# Altium PCB mla_opamp.PcbDoc (part 1 of 3)
Units mil, origin at the board's own origin, x right, y up, seen from the top; angles counter-clockwise.
Board outline 7165.35 x 3582.68 mil, 4 copper layers (Top Layer, PWD, GND, Bottom Layer), stack 23.756 mil thick; 177 components, 237 nets, 809 pads, 473 vias.
Unrouted connection lines stored in the file: 312.
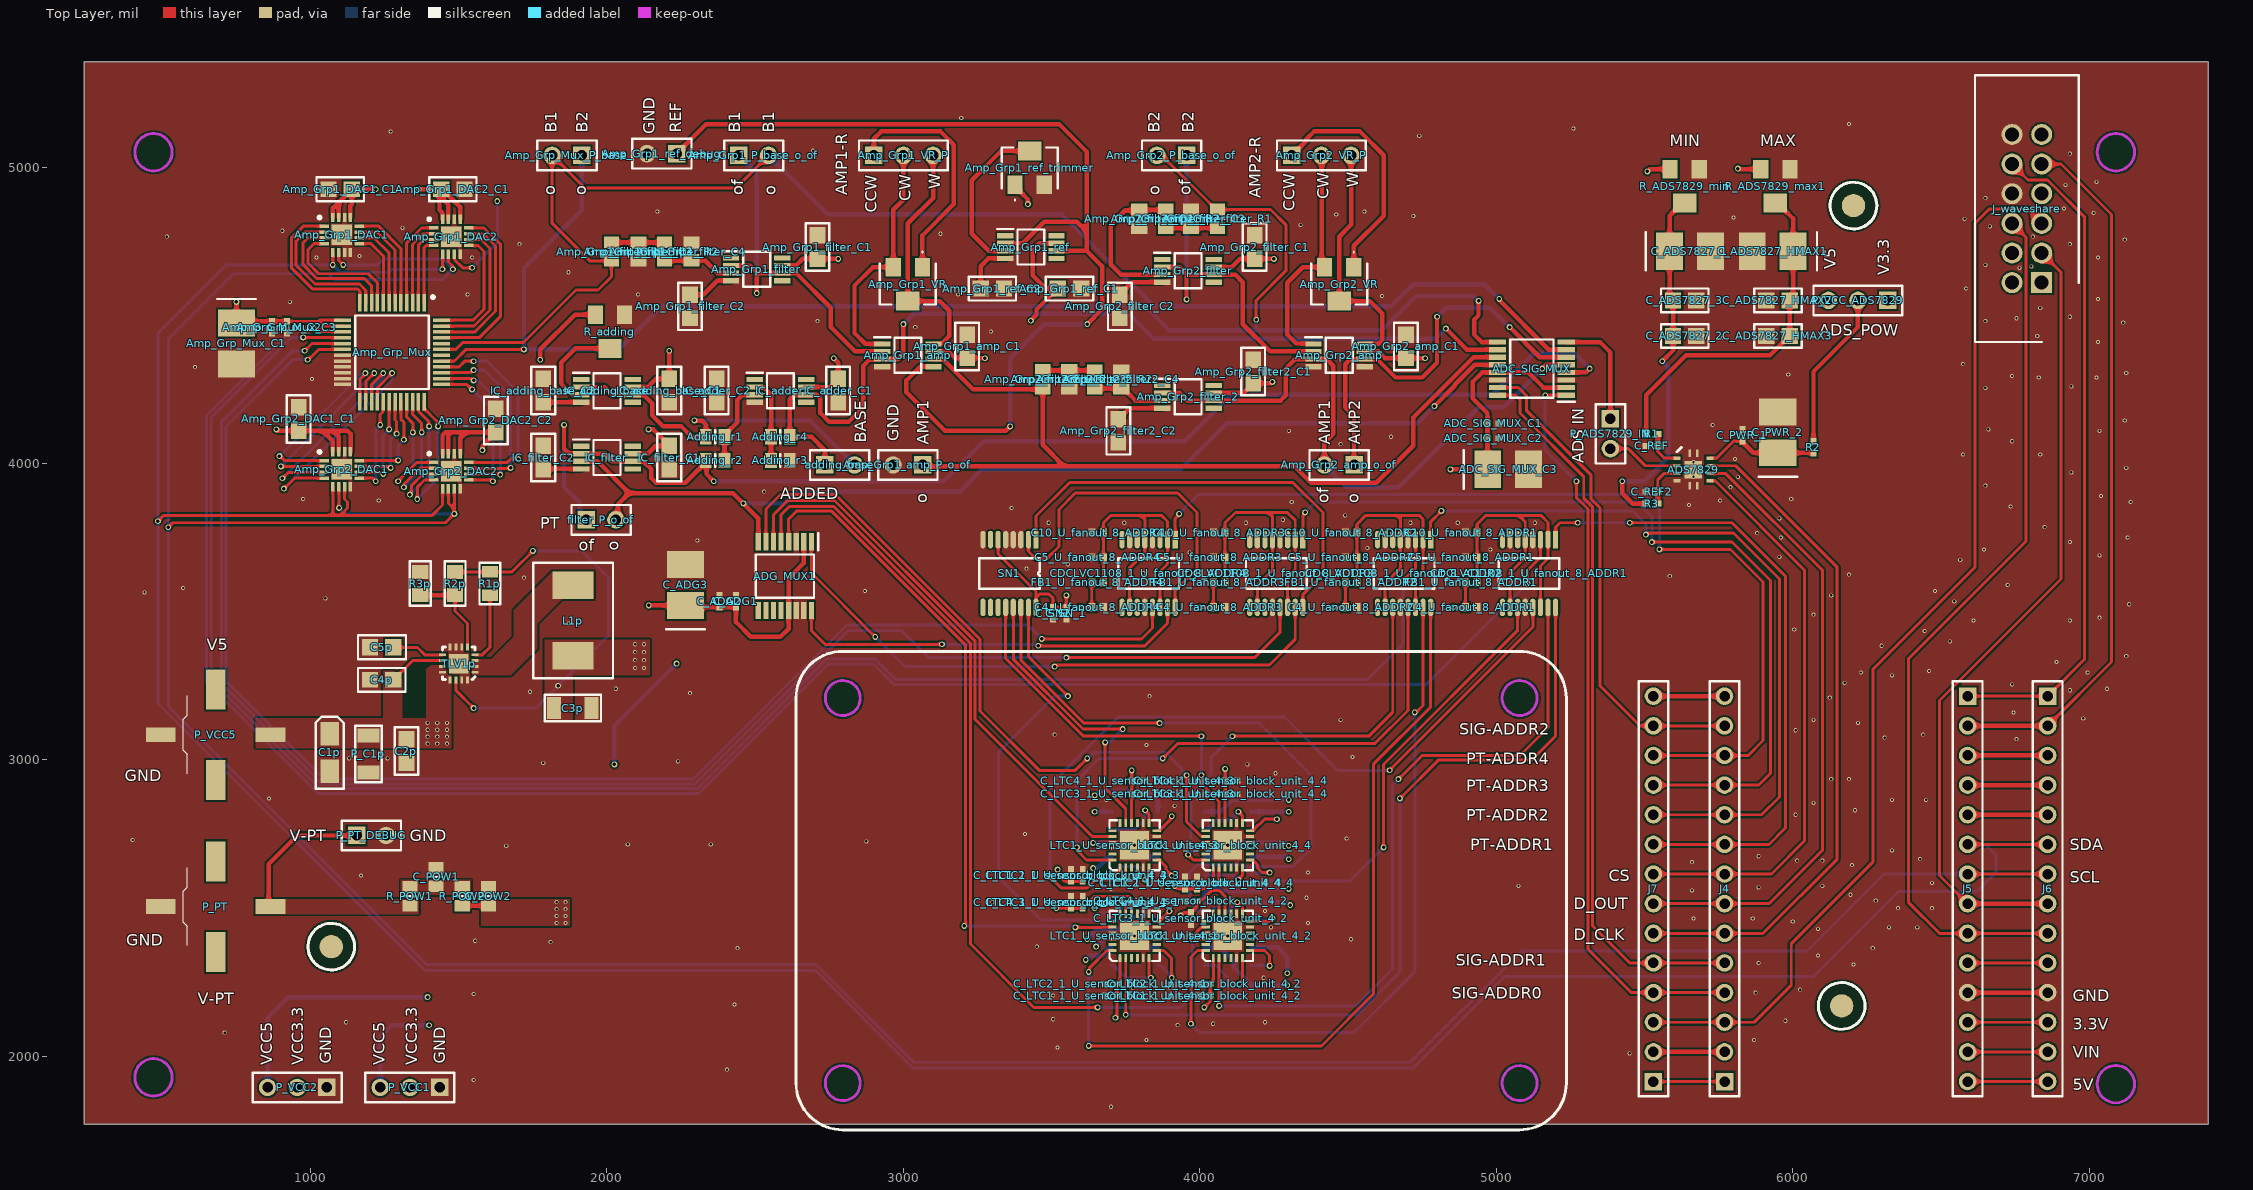
[diagram p0: Top Layer view]
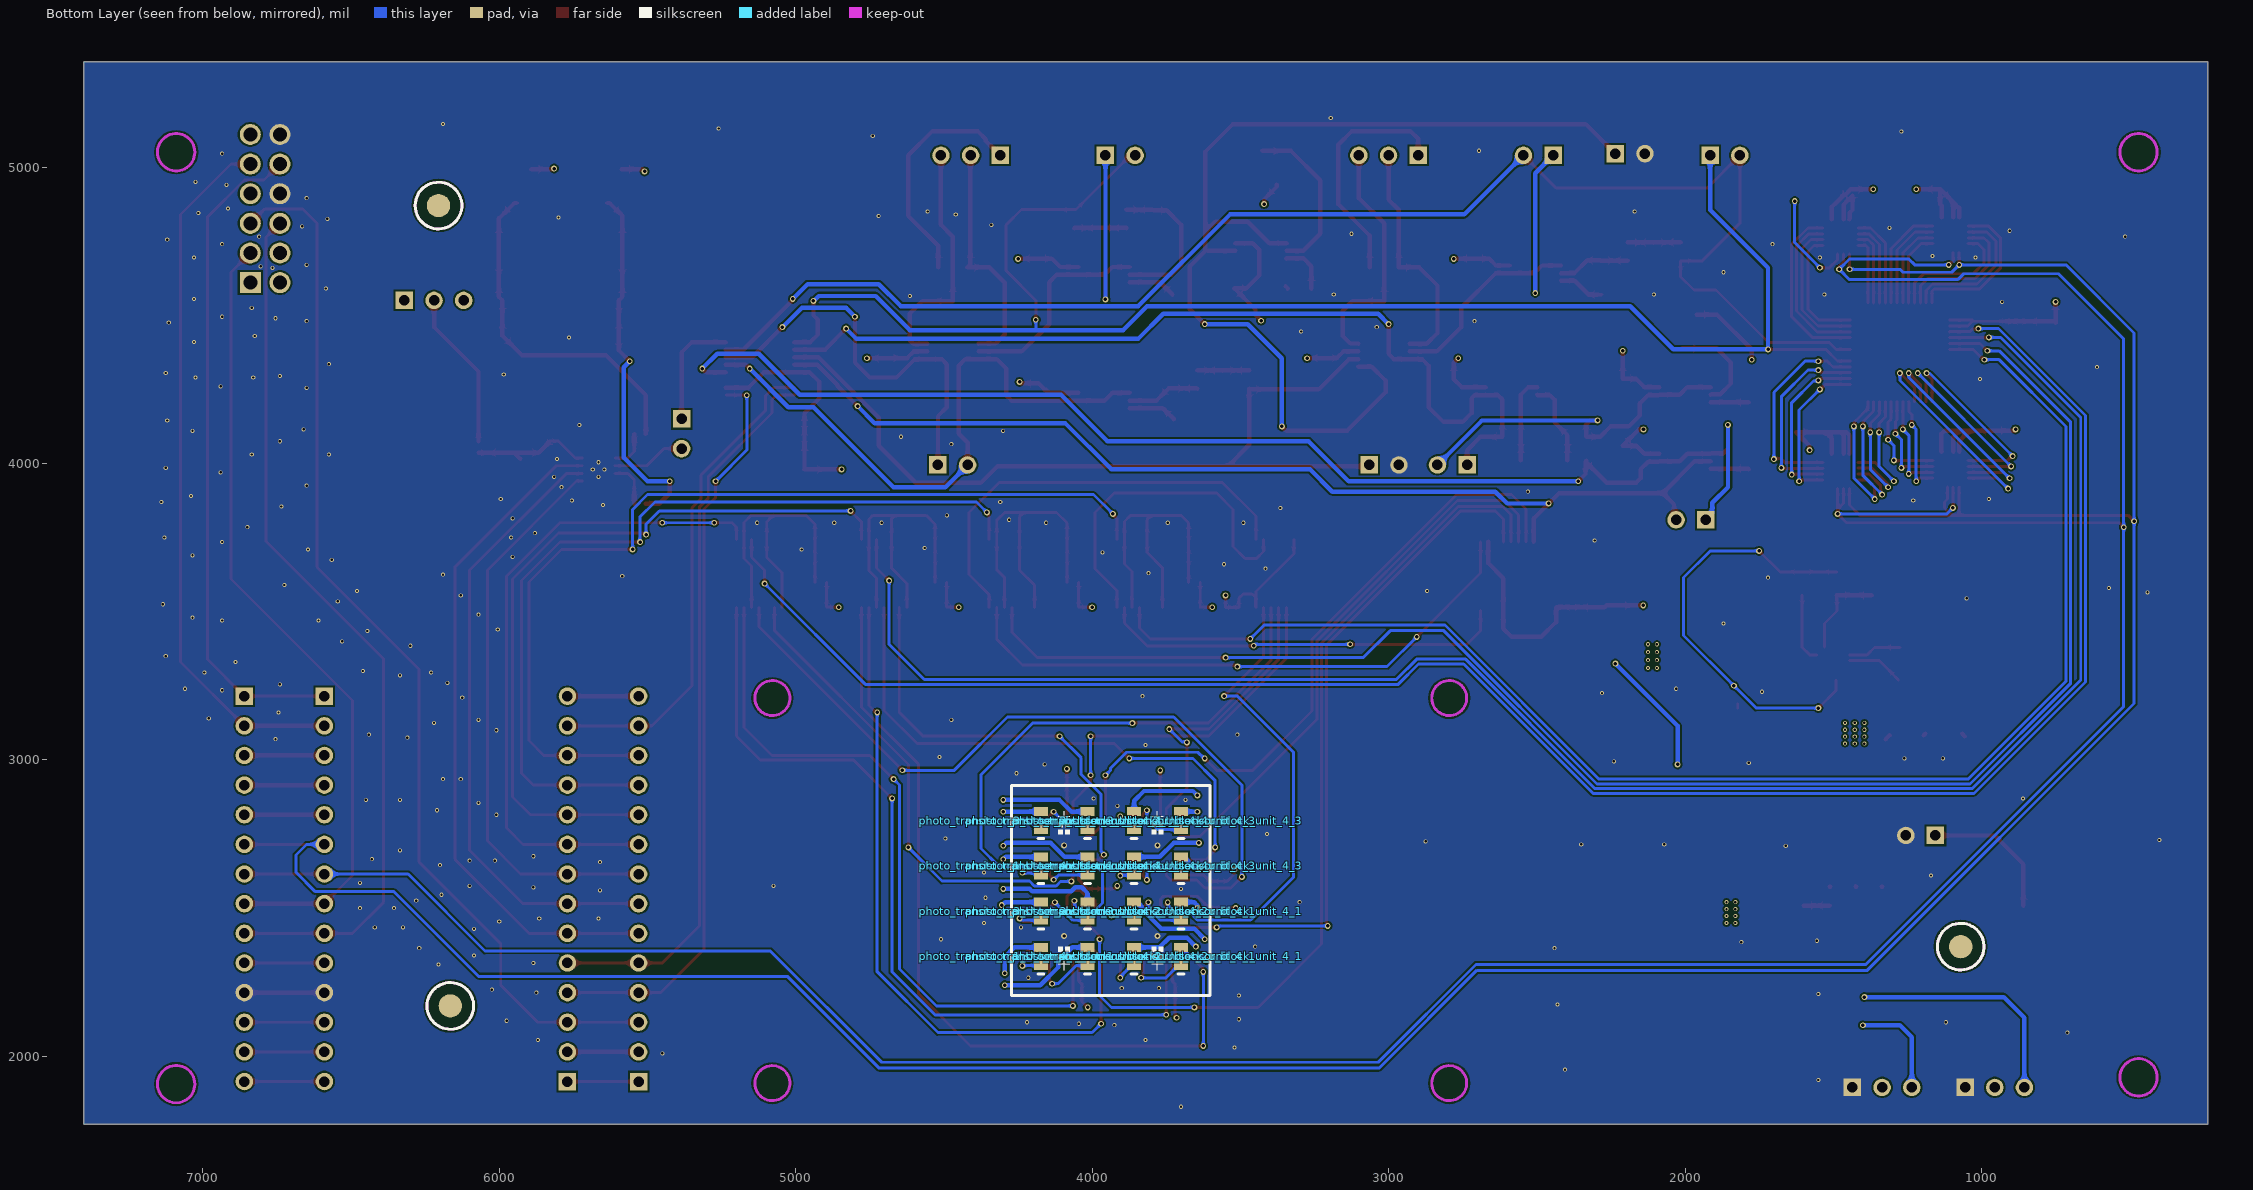
[diagram p1: Bottom Layer view, seen from below]
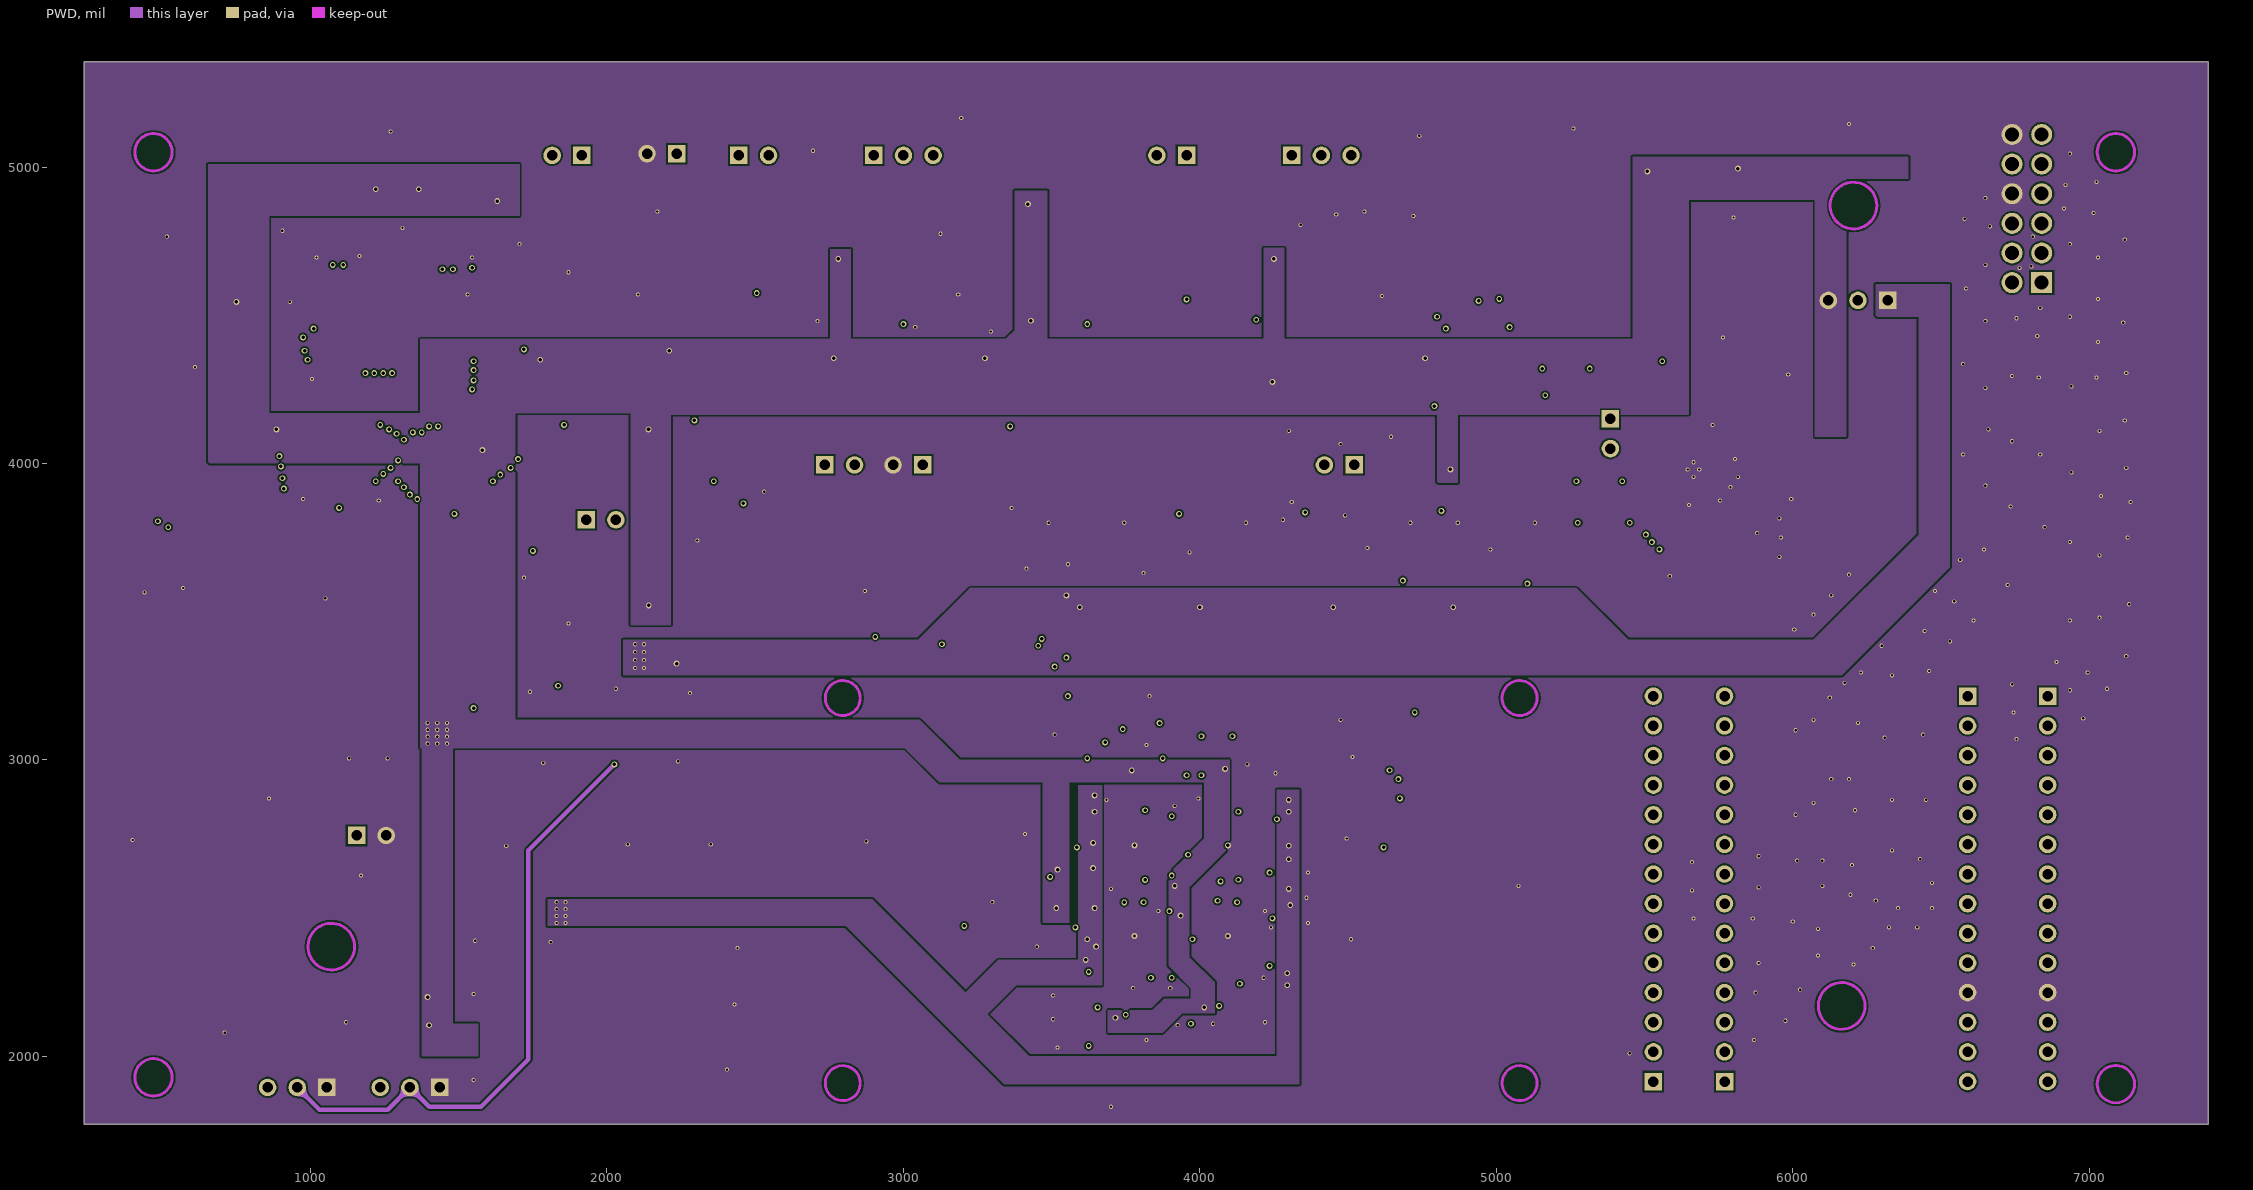
[diagram p2: PWD]
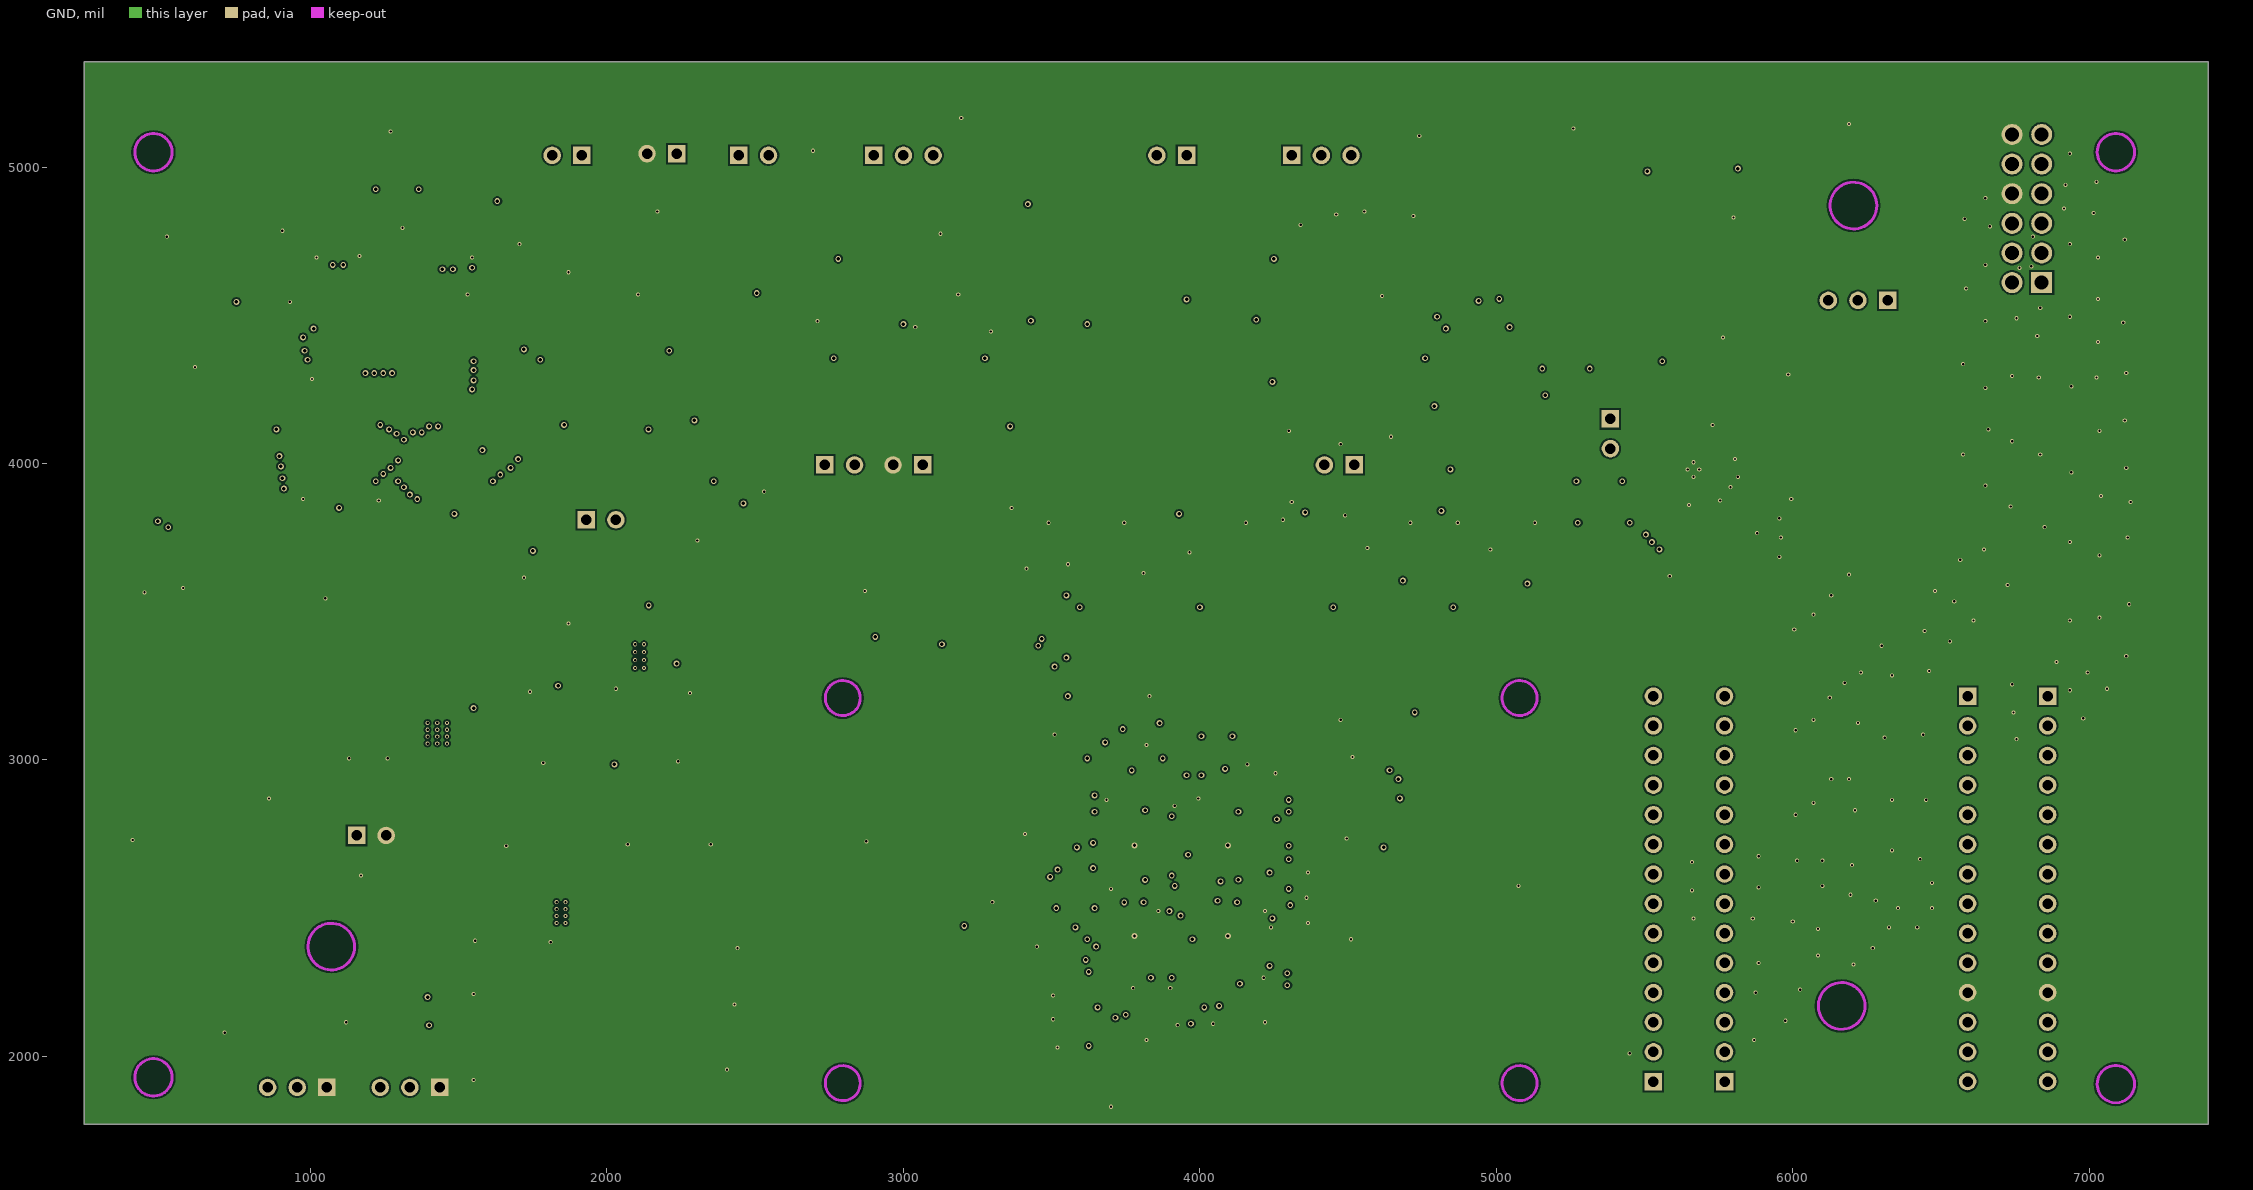
[diagram p3: GND]

## Layer stack, top to bottom
Top Solder: solder mask 0.4, Solder Resist, Dk 3.5
Top Layer: signal copper 1.4
Dielectric 2: prepreg 2.8, PP-006, Dk 4.1
PWD: signal copper 1.378
Dielectric 1: dielectric 12.6, FR-4, Dk 4.8
GND: signal copper 1.378
Dielectric 3: prepreg 2.8, PP-006, Dk 4.1
Bottom Layer: signal copper 1.4
Bottom Solder: solder mask 0.4, Solder Resist, Dk 3.5

## Board outline
236.22,1771.65 7401.57,1771.65 7401.57,5354.33 236.77,5354.33 236.22,5353.78 236.22,5236.22

## Design rules (kind name [scope] priority, off if disabled: settings)
Clearance [All] p1: gap=6 ignorepadtopadclearanceinfootprint=FALSE
HoleSize [All] p1: absolutevalues=TRUE maxlimit=100 minlimit=6 maxpercent=80.000 minpercent=20.000
PlaneConnect PlaneConnect_1 [InNet('GND')] p1: planeconnectstyle=Relief reliefexpansion=20 reliefentries=4 reliefconductorwidth=10 reliefairgap=10
PlaneConnect [All] p2: planeconnectstyle=Relief reliefexpansion=20 reliefentries=4 reliefconductorwidth=10 reliefairgap=10
PolygonConnect [All] p1: connectstyle=Direct reliefconductorwidth=10 reliefentries=4 polygonreliefangle="90 Angle" airgapwidth=10
RoutingVias [All] p1: holewidth=11.81 width=19.68 viastyle="Through Hole" minholewidth=9.84 minwidth=10 maxholewidth=28 maxwidth=50
SolderMaskExpansion [All] p1: expansion=4 istentingtop=FALSE
Width [All] p1: maxlimit=50 minlimit=6 preferedwidth=10
28 further rules are at their usual default settings.

## Classes and differential pairs
channel class sensor_block_unit_4: U_sensor_block_unit_4_1 U_sensor_block_unit_4_2 U_sensor_block_unit_4_3 U_sensor_block_unit_4_4
channel class fanout_8: U_fanout_8_ADDR1 U_fanout_8_ADDR2 U_fanout_8_ADDR3 U_fanout_8_ADDR4
component class U_sensor_module: ADG_MUX1 C_ADG1 C_ADG2 C_ADG3 C_SN2 C_SN_1 SN1
component class U_sensor_block_unit_4_4: C_LTC1_1_U_sensor_block_unit_4_4 C_LTC2_1_U_sensor_block_unit_4_4 C_LTC3_1_U_sensor_block_unit_4_4 C_LTC4_1_U_sensor_block_unit_4_4 LTC1_U_sensor_block_unit_4_4 photo_transistor_1_U_sensor_block_unit_4_4 photo_transistor_2_U_sensor_block_unit_4_4 photo_transistor_3_U_sensor_block_unit_4_4 photo_transistor_4_U_sensor_block_unit_4_4
component class U_sensor_block_unit_4_3: C_LTC1_1_U_sensor_block_unit_4_3 C_LTC2_1_U_sensor_block_unit_4_3 C_LTC3_1_U_sensor_block_unit_4_3 C_LTC4_1_U_sensor_block_unit_4_3 LTC1_U_sensor_block_unit_4_3 photo_transistor_1_U_sensor_block_unit_4_3 photo_transistor_2_U_sensor_block_unit_4_3 photo_transistor_3_U_sensor_block_unit_4_3 photo_transistor_4_U_sensor_block_unit_4_3
component class U_sensor_block_unit_4_2: C_LTC1_1_U_sensor_block_unit_4_2 C_LTC2_1_U_sensor_block_unit_4_2 C_LTC3_1_U_sensor_block_unit_4_2 C_LTC4_1_U_sensor_block_unit_4_2 LTC1_U_sensor_block_unit_4_2 photo_transistor_1_U_sensor_block_unit_4_2 photo_transistor_2_U_sensor_block_unit_4_2 photo_transistor_3_U_sensor_block_unit_4_2 photo_transistor_4_U_sensor_block_unit_4_2
component class U_sensor_block_unit_4_1: C_LTC1_1_U_sensor_block_unit_4_1 C_LTC2_1_U_sensor_block_unit_4_1 C_LTC3_1_U_sensor_block_unit_4_1 C_LTC4_1_U_sensor_block_unit_4_1 LTC1_U_sensor_block_unit_4_1 photo_transistor_1_U_sensor_block_unit_4_1 photo_transistor_2_U_sensor_block_unit_4_1 photo_transistor_3_U_sensor_block_unit_4_1 photo_transistor_4_U_sensor_block_unit_4_1
component class U_power_sheet: C1p C2p C3p C4p C5p L1p P_C1p R1p R2p R3p TLV1p
component class U_fanout_8_ADDR4: C4_U_fanout_8_ADDR4 C5_U_fanout_8_ADDR4 C10_U_fanout_8_ADDR4 CDCLVC1108_1_U_fanout_8_ADDR4 FB1_U_fanout_8_ADDR4
component class U_fanout_8_ADDR3: C4_U_fanout_8_ADDR3 C5_U_fanout_8_ADDR3 C10_U_fanout_8_ADDR3 CDCLVC1108_1_U_fanout_8_ADDR3 FB1_U_fanout_8_ADDR3
component class U_fanout_8_ADDR2: C4_U_fanout_8_ADDR2 C5_U_fanout_8_ADDR2 C10_U_fanout_8_ADDR2 CDCLVC1108_1_U_fanout_8_ADDR2 FB1_U_fanout_8_ADDR2
component class U_fanout_8_ADDR1: C4_U_fanout_8_ADDR1 C5_U_fanout_8_ADDR1 C10_U_fanout_8_ADDR1 CDCLVC1108_1_U_fanout_8_ADDR1 FB1_U_fanout_8_ADDR1
component class U_arduino_mkr_vidor_4000: J4 J5 J6 J7
component class U_amplifier_module: adding_base Adding_r1 Adding_r2 Adding_r3 Adding_r4 Amp_Grp1_amp Amp_Grp1_amp_C1 Amp_Grp1_amp_P_o_of Amp_Grp1_DAC1 Amp_Grp1_DAC1_C1 Amp_Grp1_DAC2 Amp_Grp1_DAC2_C1 Amp_Grp1_filter Amp_Grp1_filter_C1 Amp_Grp1_filter_C2 Amp_Grp1_filter_C3 Amp_Grp1_filter_C4 Amp_Grp1_filter_R1 Amp_Grp1_filter_R2 Amp_Grp1_P_base_o_of Amp_Grp1_ref Amp_Grp1_ref_C1 Amp_Grp1_ref_C2 Amp_Grp1_ref_debug Amp_Grp1_ref_trimmer Amp_Grp1_VR Amp_Grp1_VR_P Amp_Grp2_amp Amp_Grp2_amp_C1 Amp_Grp2_amp_o_of Amp_Grp2_DAC1 Amp_Grp2_DAC1_C1 Amp_Grp2_DAC2 Amp_Grp2_DAC2_C2 Amp_Grp2_filter Amp_Grp2_filter2_C1 Amp_Grp2_filter2_C2 Amp_Grp2_filter2_C3 Amp_Grp2_filter2_C4 Amp_Grp2_filter2_R1 Amp_Grp2_filter2_R2 Amp_Grp2_filter_2 Amp_Grp2_filter_C1 Amp_Grp2_filter_C2 Amp_Grp2_filter_C3 Amp_Grp2_filter_C4 Amp_Grp2_filter_R1 Amp_Grp2_filter_R2 Amp_Grp2_P_base_o_of Amp_Grp2_VR Amp_Grp2_VR_P Amp_Grp_Mux Amp_Grp_Mux_C1 Amp_Grp_Mux_C2 Amp_Grp_Mux_C3 Amp_Grp_Mux_P_base filter_P_o_of IC_adder IC_adder_C1 IC_adder_C2 IC_adding_base IC_adding_base_C1 IC_adding_base_C2 IC_filter IC_filter_C1 IC_filter_C2 R_adding
component class U_ADS7829_module: ADS7829 C_ADS7827_1 C_ADS7827_2 C_ADS7827_3 C_ADS7827_HMAX1 C_ADS7827_HMAX2 C_ADS7827_HMAX3 C_PWR_1 C_PWR_2 C_REF C_REF2 P_VCC_ADS7829 R1 R2 R3 R_ADS7829_max1 R_ADS7829_min
component class mla_opamp_top: ADC_SIG_MUX ADC_SIG_MUX_C1 ADC_SIG_MUX_C2 ADC_SIG_MUX_C3 C_POW1 C_POW2 J_waveshare P_ADS7829_IN P_PT P_PT_DEBUG P_VCC1 P_VCC2 P_VCC5 R_POW1 R_POW2

## Components (designator, comment, footprint, x,y, rotation, side; value= is the part's Value field where it differs from the comment)
ADC_SIG_MUX "ADG708BRUZ-REEL" SOP65P640X120-16N 5120,4320 r180 top
ADC_SIG_MUX_C1 "0402B104K250CT" 0402 4990,4135 r0 top value=100nf
ADC_SIG_MUX_C2 "0402X105K250CT" 0402 4990,4085 r0 top value=1uf
ADC_SIG_MUX_C3 "TAJB685M016RNJ" TAJ_1210 5040,3980 r0 top value=6.8uf
adding_base "77311-102-03LF" HDR1X2 2735,3995 r0 top
Adding_r1 "CRT0805-BY-1002EAS" 6-0805_L 2365,4090 r0 top value=10K
Adding_r2 "CRT0805-BY-1002EAS" 6-0805_L 2365,4010 r0 top value=10K
Adding_r3 "CRT0805-BY-1002EAS" 6-0805_L 2585,4010 r0 top value=10K
Adding_r4 "CRT0805-BY-1002EAS" 6-0805_L 2585,4090 r0 top value=10K
ADG_MUX1 "ADG708BRUZ-REEL" SOP65P640X120-16N 2600,3620 r270 top
ADS7829 "ADS7829IBDRBR" DRB0008A 5665,3979.47 r0 top
Amp_Grp1_amp "LT6370IMS8#TRPBF" SOP65P490X110-8N 3015,4365 r0 top
Amp_Grp1_amp_C1 "CL21B104KBCNNNC" SAMSUNG_CAP_0805 3215,4395 r270 top value=0.1uF
Amp_Grp1_amp_P_o_of "77311-102-03LF" HDR1X2 3065,3995 r180 top
Amp_Grp1_DAC1 "DAC53608RTER" QFN50P300X300X80-17N-D 1105,4770.84 r0 top
Amp_Grp1_DAC1_C1 "CL21B104KBCNNNC" SAMSUNG_CAP_0805 1100,4925 r180 top value=0.1uF
Amp_Grp1_DAC2 "DAC53608RTER" QFN50P300X300X80-17N-D 1475,4765 r0 top
Amp_Grp1_DAC2_C1 "CL21B104KBCNNNC" SAMSUNG_CAP_0805 1480,4925 r0 top value=0.1uF
Amp_Grp1_filter "OPA188AQDGKRQ1" SOP65P490X110-8N 2505,4655 r0 top
Amp_Grp1_filter_C1 "CL21B104KBCNNNC" SAMSUNG_CAP_0805 2710,4730 r270 top value=0.1uF
Amp_Grp1_filter_C2 "CL21B104KBCNNNC" SAMSUNG_CAP_0805 2280,4530 r270 top value=0.1uF
Amp_Grp1_filter_C3 "0805B103K201CT" C0805 2106.31,4715 r90 top value=10nF
Amp_Grp1_filter_C4 "0805B103K201CT" C0805 2285,4715 r270 top value=10nF
Amp_Grp1_filter_R1 "SR0805FR-471KL" 6-0805_L 2015,4715 r90 top value=1K
Amp_Grp1_filter_R2 "SR0805FR-471KL" 6-0805_L 2193.69,4715 r270 top value=1K
Amp_Grp1_P_base_o_of "77311-102-03LF" HDR1X2 2445,5039.37 r0 top
Amp_Grp1_ref "OPA188AQDGKRQ1" SOP65P490X110-8N 3430,4730 r0 top
Amp_Grp1_ref_C1 "CL21B104KBCNNNC" SAMSUNG_CAP_0805 3560,4590 r180 top value=0.1uF
Amp_Grp1_ref_C2 "CL21B104KBCNNNC" SAMSUNG_CAP_0805 3300,4590 r180 top value=0.1uF
Amp_Grp1_ref_debug "77311-102-03LF" HDR1X2 2235,5045 r180 top
Amp_Grp1_ref_trimmer "3224W-1-104G" 3224W1104G 3425.79,4997.09 r90 top
Amp_Grp1_VR "3224W-1-104G" 3224W1104G 3015,4605 r270 top
Amp_Grp1_VR_P "MTP125-1140S1" HDR1X3 2900,5039.37 r0 top
Amp_Grp2_amp "LT6370IMS8#TRPBF" SOP65P490X110-8N 4470,4365 r0 top
Amp_Grp2_amp_C1 "CL21B104KBCNNNC" SAMSUNG_CAP_0805 4695,4395 r270 top value=0.1uF
Amp_Grp2_amp_o_of "77311-102-03LF" HDR1X2 4520,3995 r180 top
Amp_Grp2_DAC1 "DAC53608RTER" QFN50P300X300X80-17N-D 1105,3980 r0 top
Amp_Grp2_DAC1_C1 "CL21B104KBCNNNC" SAMSUNG_CAP_0805 960,4150 r90 top value=0.1uF
Amp_Grp2_DAC2 "DAC53608RTER" QFN50P300X300X80-17N-D 1475,3974.16 r0 top
Amp_Grp2_DAC2_C2 "CL21B104KBCNNNC" SAMSUNG_CAP_0805 1625,4145 r90 top value=0.1uF
Amp_Grp2_filter "OPA188AQDGKRQ1" SOP65P490X110-8N 3960,4650 r0 top
Amp_Grp2_filter2_C1 "CL21B104KBCNNNC" SAMSUNG_CAP_0805 4180,4310 r270 top value=0.1uF
Amp_Grp2_filter2_C2 "CL21B104KBCNNNC" SAMSUNG_CAP_0805 3725,4110 r90 top value=0.1uF
Amp_Grp2_filter2_C3 "0805B103K201CT" C0805 3559.65,4283.5 r90 top value=10nF
Amp_Grp2_filter2_C4 "0805B103K201CT" C0805 3735,4283.5 r270 top value=10nF
Amp_Grp2_filter2_R1 "SR0805FR-471KL" 6-0805_L 3470,4283.5 r90 top value=1K
Amp_Grp2_filter2_R2 "SR0805FR-471KL" 6-0805_L 3645.35,4283.5 r270 top value=1K
Amp_Grp2_filter_2 "OPA188AQDGKRQ1" SOP65P490X110-8N 3960,4225 r0 top
Amp_Grp2_filter_C1 "CL21B104KBCNNNC" SAMSUNG_CAP_0805 4185,4730 r270 top value=0.1uF
Amp_Grp2_filter_C2 "CL21B104KBCNNNC" SAMSUNG_CAP_0805 3730,4530 r90 top value=0.1uF
Amp_Grp2_filter_C3 "0805B103K201CT" C0805 3970.35,4825 r270 top value=10nF
Amp_Grp2_filter_C4 "0805B103K201CT" C0805 3795,4825 r90 top value=10nF
Amp_Grp2_filter_R1 "SR0805FR-471KL" 6-0805_L 4060,4825 r270 top value=1K
Amp_Grp2_filter_R2 "SR0805FR-471KL" 6-0805_L 3884.65,4825 r90 top value=1K
Amp_Grp2_P_base_o_of "77311-102-03LF" HDR1X2 3955,5039.37 r180 top
Amp_Grp2_VR "3224W-1-104G" 3224W1104G 4470,4605 r270 top
Amp_Grp2_VR_P "MTP125-1140S1" HDR1X3 4310,5039.37 r0 top
Amp_Grp_Mux "ADG726BSUZ" QFP50P900X900X120-48N 1275,4375 r270 top locked
Amp_Grp_Mux_C1 "TAJB685M016RNJ" TAJ_1210 750,4405 r270 top value=6.8uf
Amp_Grp_Mux_C2 "0402X105K250CT" 0402 870,4460 r270 top value=1uf
Amp_Grp_Mux_C3 "0402B104K250CT" 0402 920,4460 r270 top value=100nf
Amp_Grp_Mux_P_base "77311-102-03LF" HDR1X2 1915,5039.37 r180 top
C1p "TAJA475K025RNJ" Capacitor_1206_A 1065,3025 r90 top value=4.7uF
C2p "CL21B104KBCNNNC" SAMSUNG_CAP_0805 1323.5,3030 r90 top value=0.1uF
C3p "1206X226K100CT" FH_CAP_1206 1885,3175 r180 top value=22uF
C4_U_fanout_8_ADDR1 "0402X106M100NT" 0402_my 4915.31,3515 r180 top value=10uF (schematic designator C4)
C4_U_fanout_8_ADDR2 "0402X106M100NT" 0402_my 4510.31,3515 r180 top value=10uF (schematic designator C4)
C4_U_fanout_8_ADDR3 "0402X106M100NT" 0402_my 4065,3515 r180 top value=10uF (schematic designator C4)
C4_U_fanout_8_ADDR4 "0402X106M100NT" 0402_my 3655,3515 r180 top value=10uF (schematic designator C4)
C4p "CL21B104KBCNNNC" SAMSUNG_CAP_0805 1240,3270 r0 top value=0.1uF
C5_U_fanout_8_ADDR1 "0402X105K100NT" 0402_my 4915.31,3682.78 r0 top value=1uF (schematic designator C5)
C5_U_fanout_8_ADDR2 "0402X105K100NT" 0402_my 4510.31,3682.78 r0 top value=1uF (schematic designator C5)
C5_U_fanout_8_ADDR3 "0402X105K100NT" 0402_my 4065,3682.78 r0 top value=1uF (schematic designator C5)
C5_U_fanout_8_ADDR4 "0402X105K100NT" 0402_my 3655,3682.78 r0 top value=1uF (schematic designator C5)
C5p "0805B332K500CT" FH_CAP_0805 1240,3380 r180 top value=3.3nF
C10_U_fanout_8_ADDR1 "0402X104K250CT" 0402_my 4915.31,3766.67 r0 top value=100nF (schematic designator C10)
C10_U_fanout_8_ADDR2 "0402X104K250CT" 0402_my 4510.31,3766.67 r0 top value=100nF (schematic designator C10)
C10_U_fanout_8_ADDR3 "0402X104K250CT" 0402_my 4065,3766.67 r0 top value=100nF (schematic designator C10)
C10_U_fanout_8_ADDR4 "0402X104K250CT" 0402_my 3655,3766.67 r0 top value=100nF (schematic designator C10)
C_ADG1 "0402B104K250CT" 0402 2435,3534.68 r90 top value=100nf
C_ADG2 "0402X105K250CT" 0402 2380,3535 r90 top value=1uf
C_ADG3 "TAJB685M016RNJ" TAJ_1210 2265,3590 r90 top value=6.8uf
C_ADS7827_1 "TAJB685M016RNJ" TAJ_1210 5653.36,4715.83 r0 top value=6.8uf
C_ADS7827_2 "CL21B104KBCNNNC" SAMSUNG_CAP_0805 5635.68,4430 r180 top value=0.1uF
C_ADS7827_3 "0805B102J500NT" SAMSUNG_CAP_0805 5635.68,4550 r180 top value=1nF
C_ADS7827_HMAX1 "TAJB685M016RNJ" TAJ_1210 5932.14,4715.83 r180 top value=6.8uf
C_ADS7827_HMAX2 "CL21B104KBCNNNC" SAMSUNG_CAP_0805 5950,4550 r0 top value=0.1uF
C_ADS7827_HMAX3 "0805B102J500NT" SAMSUNG_CAP_0805 5950,4430 r0 top value=1nF
C_LTC1_1_U_sensor_block_unit_4_1 "0402B104K250CT" 0402 3700,2205 r180 top value=100nf (schematic designator C_LTC1_1)
C_LTC1_1_U_sensor_block_unit_4_2 "0402B104K250CT" 0402 4015,2205 r180 top value=100nf (schematic designator C_LTC1_1)
C_LTC1_1_U_sensor_block_unit_4_3 "0402B104K250CT" 0402 3565,2610.32 r90 top value=100nf (schematic designator C_LTC1_1)
C_LTC1_1_U_sensor_block_unit_4_4 "0402B104K250CT" 0402 3950,2585 r90 top locked value=100nf (schematic designator C_LTC1_1)
C_LTC2_1_U_sensor_block_unit_4_1 "CC0402KRX7R9BB102" 0402 3700,2245 r180 top value=1nf (schematic designator C_LTC2_1)
C_LTC2_1_U_sensor_block_unit_4_2 "CC0402KRX7R9BB102" 0402 4015,2245 r180 top value=1nf (schematic designator C_LTC2_1)
C_LTC2_1_U_sensor_block_unit_4_3 "CC0402KRX7R9BB102" 0402 3605,2610.32 r90 top value=1nf (schematic designator C_LTC2_1)
C_LTC2_1_U_sensor_block_unit_4_4 "CC0402KRX7R9BB102" 0402 3990,2585 r90 top locked value=1nf (schematic designator C_LTC2_1)
C_LTC3_1_U_sensor_block_unit_4_1 "CC0402KRX7R9BB102" 0402 3605,2520 r90 top value=1nf (schematic designator C_LTC3_1)
C_LTC3_1_U_sensor_block_unit_4_2 "CC0402KRX7R9BB102" 0402 3970,2465 r270 top value=1nf (schematic designator C_LTC3_1)
C_LTC3_1_U_sensor_block_unit_4_3 "CC0402KRX7R9BB102" 0402 3790,2885 r0 top value=1nf (schematic designator C_LTC3_1)
C_LTC3_1_U_sensor_block_unit_4_4 "CC0402KRX7R9BB102" 0402 4105,2885 r0 top locked value=1nf (schematic designator C_LTC3_1)
C_LTC4_1_U_sensor_block_unit_4_1 "0402B104K250CT" 0402 3565,2520 r90 top value=100nf (schematic designator C_LTC4_1)
C_LTC4_1_U_sensor_block_unit_4_2 "0402B104K250CT" 0402 3970,2525 r180 top value=100nf (schematic designator C_LTC4_1)
C_LTC4_1_U_sensor_block_unit_4_3 "0402B104K250CT" 0402 3790,2930 r0 top value=100nf (schematic designator C_LTC4_1)
C_LTC4_1_U_sensor_block_unit_4_4 "0402B104K250CT" 0402 4105,2930 r0 top locked value=100nf (schematic designator C_LTC4_1)
C_POW1 "0805B103J101CT" 6-0805_L 1423.33,2605 r90 top value=10nf
C_POW2 "0805B103J101CT" 6-0805_L 1600,2540 r90 top value=10nf
C_PWR_1 "0402B104K250CT" 0402 5830,4095 r90 top value=100nf
C_PWR_2 "TAJB685M016RNJ" TAJ_1210 5950,4105 r90 top value=6.8uf
C_REF "0402B104K250CT" 0402 5525,4059.47 r180 top value=100nf
C_REF2 "0402B104K250CT" 0402 5525,3904.47 r180 top value=100nf
C_SN2 "0402B104K250CT" 0402 3505,3495 r270 top value=100nf
C_SN_1 "0402X105K250CT" 0402 3550,3495 r270 top value=1uf
CDCLVC1108_1_U_fanout_8_ADDR1 "CDCLVC1108PWR" PW16_NEW 5200,3743.03 r270 top (schematic designator CDCLVC1108_1)
CDCLVC1108_1_U_fanout_8_ADDR2 "CDCLVC1108PWR" PW16_NEW 4778.68,3743.03 r270 top (schematic designator CDCLVC1108_1)
CDCLVC1108_1_U_fanout_8_ADDR3 "CDCLVC1108PWR" PW16_NEW 4347.36,3743.03 r270 top (schematic designator CDCLVC1108_1)
CDCLVC1108_1_U_fanout_8_ADDR4 "CDCLVC1108PWR" PW16_NEW 3916.77,3743.03 r270 top (schematic designator CDCLVC1108_1)
FB1_U_fanout_8_ADDR1 "CBG100505U500T" 0402_my 4915.31,3598.89 r0 top (schematic designator FB1)
FB1_U_fanout_8_ADDR2 "CBG100505U500T" 0402_my 4510.31,3598.89 r0 top (schematic designator FB1)
FB1_U_fanout_8_ADDR3 "CBG100505U500T" 0402_my 4065,3598.89 r0 top (schematic designator FB1)
FB1_U_fanout_8_ADDR4 "CBG100505U500T" 0402_my 3655,3598.89 r0 top (schematic designator FB1)
filter_P_o_of "77311-102-03LF" HDR1X2 1930,3810 r0 top
IC_adder "OPA188AQDGKRQ1" SOP65P490X110-8N 2585,4245 r0 top
IC_adder_C1 "CL21B104KBCNNNC" SAMSUNG_CAP_0805 2780,4245.98 r90 top value=0.1uF
IC_adder_C2 "CL21B104KBCNNNC" SAMSUNG_CAP_0805 2370,4245.98 r90 top value=0.1uF
IC_adding_base "OPA188AQDGKRQ1" SOP65P490X110-8N 2000,4245 r0 top
IC_adding_base_C1 "CL21B104KBCNNNC" SAMSUNG_CAP_0805 2210,4245.98 r90 top value=0.1uF
IC_adding_base_C2 "CL21B104KBCNNNC" SAMSUNG_CAP_0805 1785,4245.98 r90 top value=0.1uF
IC_filter "OPA188AQDGKRQ1" SOP65P490X110-8N 2000,4020 r0 top
IC_filter_C1 "CL21B104KBCNNNC" SAMSUNG_CAP_0805 2210,4020 r90 top value=0.1uF
IC_filter_C2 "CL21B104KBCNNNC" SAMSUNG_CAP_0805 1785,4020 r90 top value=0.1uF
J4 "MTP125-1140S1" HDR1X14 5770,1915 r90 top
J5 "MTP125-1140S1" HDR1X14 6590,3215 r270 top
J6 "MTP125-1140S1" HDR1X14 6860,3215 r270 top
J7 "MTP125-1140S1" HDR1X14 5530,1915 r90 top
J_waveshare "70246-1201" SHDR12W99P254_2X6_2286X889X927P 6840,4610 r90 top locked
L1p "AMRU000606302R2MA1" INDUCTOR_0630 1885,3470 r270 top value=2.2uH
LTC1_U_sensor_block_unit_4_1 "LTC6561IUF#PBF" LTC-DWG 3779.53,2406.3 r90 top (schematic designator LTC1)
LTC1_U_sensor_block_unit_4_2 "LTC6561IUF#PBF" LTC-DWG 4094.49,2406.3 r90 top (schematic designator LTC1)
LTC1_U_sensor_block_unit_4_3 "LTC6561IUF#PBF" LTC-DWG 3779.53,2711.81 r90 top (schematic designator LTC1)
LTC1_U_sensor_block_unit_4_4 "LTC6561IUF#PBF" LTC-DWG 4094.49,2711.81 r90 top locked (schematic designator LTC1)
P_ADS7829_IN "MTP125-1140S1" HDR1X2 5385,4150 r270 top
P_C1p "1206B106K250CT" FH_CAP_1206 1195.25,3020 r90 top value=10uF
P_PT "430450218" 430450218 680,2505 r90 top
P_PT_DEBUG "MTP125-1140S1" HDR1X2 1155,2745 r0 top
P_VCC1 "MTP125-1140S1" HDR1X3 1435,1895 r180 top
P_VCC2 "MTP125-1140S1" HDR1X3 1055,1895 r180 top
P_VCC5 "430450218" 430450218 680,3085 r90 top
P_VCC_ADS7829 "MTP125-1140S1" HDR1X3 6320,4550 r180 top
photo_transistor_1_U_sensor_block_unit_4_1 "TEMT6200FX01" TEMT6200FX01_L 3858.27,2337.01 r90 bottom (schematic designator photo_transistor_1)
photo_transistor_1_U_sensor_block_unit_4_2 "TEMT6200FX01" TEMT6200FX01_L 4173.23,2337.01 r90 bottom (schematic designator photo_transistor_1)
photo_transistor_1_U_sensor_block_unit_4_3 "TEMT6200FX01" TEMT6200FX01_L 3858.27,2642.52 r90 bottom (schematic designator photo_transistor_1)
photo_transistor_1_U_sensor_block_unit_4_4 "TEMT6200FX01" TEMT6200FX01_L 4173.23,2642.52 r90 bottom (schematic designator photo_transistor_1)
photo_transistor_2_U_sensor_block_unit_4_1 "TEMT6200FX01" TEMT6200FX01_L 3700.79,2489.76 r90 bottom (schematic designator photo_transistor_2)
photo_transistor_2_U_sensor_block_unit_4_2 "TEMT6200FX01" TEMT6200FX01_L 4015.75,2489.76 r90 bottom (schematic designator photo_transistor_2)
photo_transistor_2_U_sensor_block_unit_4_3 "TEMT6200FX01" TEMT6200FX01_L 3700.79,2795.28 r90 bottom (schematic designator photo_transistor_2)
photo_transistor_2_U_sensor_block_unit_4_4 "TEMT6200FX01" TEMT6200FX01_L 4015.75,2795.28 r90 bottom (schematic designator photo_transistor_2)
photo_transistor_3_U_sensor_block_unit_4_1 "TEMT6200FX01" TEMT6200FX01_L 3858.27,2489.76 r90 bottom (schematic designator photo_transistor_3)
photo_transistor_3_U_sensor_block_unit_4_2 "TEMT6200FX01" TEMT6200FX01_L 4173.23,2489.76 r90 bottom (schematic designator photo_transistor_3)
photo_transistor_3_U_sensor_block_unit_4_3 "TEMT6200FX01" TEMT6200FX01_L 3858.27,2795.28 r90 bottom (schematic designator photo_transistor_3)
photo_transistor_3_U_sensor_block_unit_4_4 "TEMT6200FX01" TEMT6200FX01_L 4173.23,2795.28 r90 bottom (schematic designator photo_transistor_3)
photo_transistor_4_U_sensor_block_unit_4_1 "TEMT6200FX01" TEMT6200FX01_L 3700.79,2337.01 r90 bottom (schematic designator photo_transistor_4)
photo_transistor_4_U_sensor_block_unit_4_2 "TEMT6200FX01" TEMT6200FX01_L 4015.75,2337.01 r90 bottom (schematic designator photo_transistor_4)
photo_transistor_4_U_sensor_block_unit_4_3 "TEMT6200FX01" TEMT6200FX01_L 3700.79,2642.52 r90 bottom (schematic designator photo_transistor_4)
photo_transistor_4_U_sensor_block_unit_4_4 "TEMT6200FX01" TEMT6200FX01_L 4015.75,2642.52 r90 bottom (schematic designator photo_transistor_4)
R1 "0402WGJ0100TCE" 0402 5525,4099.46 r0 top value=10ohm
R1p "RC0805FR-07100KL" YAGEO_R_0805 1605,3595 r270 top value=100K
R2 "0402WGJ0100TCE" 0402 6070,4055 r90 top value=10ohm
R2p "RC0805FR-07750KL" UNIOHM_R_0805 1487.5,3595 r270 top value=750K
R3 "0402WGJ0100TCE" 0402 5525,3864.46 r0 top value=10ohm
R3p "RC0805FR-07240KL" UNIOHM_R_0805 1370,3595 r90 top value=240K
R_adding "3224W-2-202E" 3324W 2010,4445 r90 top
R_ADS7829_max1 "3224W-2-202E" 3324W 5941.04,4935.83 r90 top
R_ADS7829_min "3224W-2-202E" 3324W 5635.68,4935.83 r90 top
R_POW1 "RC0805FR-0749R9P" 6-0805_L 1335,2540 r90 top value="50 ohm"
R_POW2 "RC0805FR-0749R9P" 6-0805_L 1511.67,2540 r270 top value="50 ohm"
SN1 "SN74HC138PWR" TSSOP16 3447.36,3743.03 r270 top
TLV1p "TLV62130ARGTR" VQFN_16 1500,3325 r180 top

## Footprints (in the part's own frame and the unit in brackets; to place one, negate y for a bottom-side part, rotate by r counter-clockwise, add the part's x,y. Pads: shape width x height; smd on the part's side, far side on the other; paste and mask are expansions set on the pad)
6-0805_L [mm] "Chip Resistor, Body 2.0x1.2mm, IPC High Density"
  rect 1x1.3 smd: 1(-0.8,0) 2(0.8,0)
  silkscreen extent 0,-0.55 0,0.55, body extent -1.07,-0.7 1.07,0.7, height 0.7
0402 [mm] "Chip Capacitor, Body 1.0x0.5mm, IPC High Density"
  rect 0.6x0.5 smd: 1(-0.5,0) 2(0.5,0)
  body extent -0.55,-0.3 0.55,0.3, height 1.3
0402_my [mm]
  rect 0.6x0.7 smd: 1(-0.5,0) 2(0.5,0)
3224W1104G [mm]
  rect 1.6x1.3 smd: 1(-1.45,1.25) 3(-1.45,-1.25)
  rect 1.6x2 smd: 2(1.45,0)
  silkscreen extent -2.8,-2.4 1.75,2.4, body extent -2.12,-2.4 2.09,2.4, height 5.65
3324W [mm]
  rect 1.6x1.3 smd: CCW(1.45,-1.25) CW(1.45,1.25)
  rect 1.6x2 smd: W(-1.45,0)
430450218 [mm]
  rect 1.27x2.54 smd: 1(0,-4.7) 2(0,4.7)
  rect 3.43x1.65 smd: 3(-3.885,0) 3(3.885,0)
  silkscreen extent -3.32,2.45 3.32,2.79
C0805 [mm] "Chip Capacitor, Body 2.0x1.3mm, IPC High Density"
  rect 1.1x1.4 smd: 1(-0.75,0) 2(0.75,0)
  body extent -1.1,-0.72 1.1,0.72, height 1.4
Capacitor_1206_A [mm]
  rect 2x1.6 smd: 1(1.6,0) 2(-1.6,0)
  silkscreen extent -3.1,-1.19 3.07,1.22
DRB0008A [mm]
  rect 0.6x0.31 smd: 1(-1.4,0.975) 2(-1.4,0.325) 3(-1.4,-0.325) 4(-1.4,-0.975) 5(1.4,-0.975) 6(1.4,-0.325) 7(1.4,0.325) 8(1.4,0.975)
  rect 0.23x0.625 smd: 9(-0.325,-1.4) 9(-0.325,1.4) 9(0.325,-1.4) 9(0.325,1.4)
  rect 1.5x1.5 smd: 9(0,0)
  silkscreen extent -1.4,1.52 -1.02,1.91
FH_CAP_0805 [mm]
  rect 1.4x1.45 smd: 1(-1,0) 2(1,0)
  silkscreen extent -2.08,-1.02 2.03,1.02
FH_CAP_1206 [mm]
  rect 1.2x1.9 smd: 1(-1.6,0) 2(1.6,0)
  silkscreen extent -2.41,-1.14 2.41,1.14
HDR1X2 [mm] "Connector; Header; 2 Position"
  rect 1.5x1.5 hole 0.9: 1(0,0)
  round 1.5 hole 0.9: 2(2.54,0)
  silkscreen extent -1.27,-1.27 3.81,1.27
HDR1X3 [mm] "Connector; Header; 3 Position"
  rect 1.5x1.5 hole 0.9: 1(0,0)
  round 1.5 hole 0.9: 2(2.54,0) 3(5.08,0)
  silkscreen extent -1.27,-1.27 6.35,1.27
HDR1X14 [mm] "Connector; Header; 14 Position"
  rect 1.5x1.5 hole 0.9: 1(0,0)
  round 1.5 hole 0.9: 2(2.54,0) 3(5.08,0) 4(7.62,0) 5(10.16,0) 6(12.7,0) 7(15.24,0) 8(17.78,0) 9(20.32,0) 10(22.86,0) 11(25.4,0) 12(27.94,0) 13(30.48,0) 14(33.02,0)
  silkscreen extent -1.27,-1.27 34.29,1.27
INDUCTOR_0630 [mm] "0630_06030"
  rect 2.35x3.5 smd: 1(-3.025,0) 2(3.025,0)
  silkscreen extent -4.95,-3.4 4.95,3.43
LTC-DWG [mm]
  oval 0.7x0.25 smd: 1(-1.9,1.25)
  rect 0.7x0.25 smd: 2(-1.9,0.75) 3(-1.9,0.25) 4(-1.9,-0.25) 5(-1.9,-0.75) 6(-1.9,-1.25) 13(1.9,-1.25) 14(1.9,-0.75) 15(1.9,-0.25) 16(1.9,0.25) 17(1.9,0.75) 18(1.9,1.25)
  rect 0.25x0.7 smd: 7(-1.25,-1.9) 8(-0.75,-1.9) 9(-0.25,-1.9) 10(0.25,-1.9) 11(0.75,-1.9) 12(1.25,-1.9) 19(1.25,1.9) 20(0.75,1.9) 21(0.25,1.9) 22(-0.25,1.9) 23(-0.75,1.9) 24(-1.25,1.9)
  rect 2.45x2.45 smd: 25(0,0)
  silkscreen extent -2.15,-2.15 2.15,2.15
PW16_NEW [mm]
  rect 1.5x0.45 smd: 1(0,0)
  oval 1.5x0.45 smd: 2(0,-0.65) 3(0,-1.3) 4(0,-1.95) 5(0,-2.6) 6(0,-3.25) 7(0,-3.9) 8(0,-4.55) 9(5.8,-4.55) 10(5.8,-3.9) 11(5.8,-3.25) 12(5.8,-2.6) 13(5.8,-1.95) 14(5.8,-1.3) 15(5.8,-0.65) 16(5.8,0)
  silkscreen extent 1.58,-4.88 4.22,0.33
QFN50P300X300X80-17N-D [mm]
  rect 0.8x0.3 smd: 1(-1.5,0.75) 2(-1.5,0.25) 3(-1.5,-0.25) 4(-1.5,-0.75) 9(1.5,-0.75) 10(1.5,-0.25) 11(1.5,0.25) 12(1.5,0.75)
  rect 0.3x0.8 smd: 5(-0.75,-1.5) 6(-0.25,-1.5) 7(0.25,-1.5) 8(0.75,-1.5) 13(0.75,1.5) 14(0.25,1.5) 15(-0.25,1.5) 16(-0.75,1.5)
  rect 1.76x1.76 smd: 17(0,0)
  silkscreen extent -2.02,1.38 -1.77,1.62, body extent -1.5,-1.5 1.5,1.5, height 0.8
QFP50P900X900X120-48N [mm]
  rect 1.475x0.3 smd: 1(-4.238,2.75) 2(-4.238,2.25) 3(-4.238,1.75) 4(-4.238,1.25) 5(-4.238,0.75) 6(-4.238,0.25) 7(-4.238,-0.25) 8(-4.238,-0.75) 9(-4.238,-1.25) 10(-4.238,-1.75) 11(-4.238,-2.25) 12(-4.238,-2.75) 25(4.238,-2.75) 26(4.238,-2.25) 27(4.238,-1.75) 28(4.238,-1.25) 29(4.238,-0.75) 30(4.238,-0.25) 31(4.238,0.25) 32(4.238,0.75) 33(4.238,1.25) 34(4.238,1.75) 35(4.238,2.25) 36(4.238,2.75)
  rect 0.3x1.475 smd: 13(-2.75,-4.238) 14(-2.25,-4.238) 15(-1.75,-4.238) 16(-1.25,-4.238) 17(-0.75,-4.238) 18(-0.25,-4.238) 19(0.25,-4.238) 20(0.75,-4.238) 21(1.25,-4.238) 22(1.75,-4.238) 23(2.25,-4.238) 24(2.75,-4.238) 37(2.75,4.238) 38(2.25,4.238) 39(1.75,4.238) 40(1.25,4.238) 41(0.75,4.238) 42(0.25,4.238) 43(-0.25,4.238) 44(-0.75,4.238) 45(-1.25,4.238) 46(-1.75,4.238) 47(-2.25,4.238) 48(-2.75,4.238)
  silkscreen extent -4.85,-3.15 3.15,3.63, body extent -4.5,-4.5 4.5,4.5, height 1.2
SAMSUNG_CAP_0805 [mm]
  rect 1.4x1.35 smd: 1(-1,0) 2(1,0)
  silkscreen extent -2.03,-1.02 2.03,1.02
SHDR12W99P254_2X6_2286X889X927P [mm]
  rect 1.8x1.8 hole 1.2: 1(0,0)
  round 1.8 hole 1.2: 2(0,2.54) 3(2.54,0) 4(2.54,2.54) 5(5.08,0) 6(5.08,2.54) 7(7.62,0) 8(7.62,2.54) 9(10.16,0) 10(10.16,2.54) 11(12.7,0) 12(12.7,2.54)
  silkscreen extent -5.08,-3.17 17.78,5.72, body extent -5.08,-3.18 17.78,5.72, height 9.27
SOP65P490X110-8N [mm]
  rect 1.4x0.45 smd: 1(-2.2,0.975) 2(-2.2,0.325) 3(-2.2,-0.325) 4(-2.2,-0.975) 5(2.2,-0.975) 6(2.2,-0.325) 7(2.2,0.325) 8(2.2,0.975)
  silkscreen extent -2.9,-1.5 1.15,1.55, body extent -2.45,-1.5 2.45,1.5, height 1.1
SOP65P640X120-16N [mm]
  rect 1.475x0.45 smd: 1(-2.938,2.275) 2(-2.938,1.625) 3(-2.938,0.975) 4(-2.938,0.325) 5(-2.938,-0.325) 6(-2.938,-0.975) 7(-2.938,-1.625) 8(-2.938,-2.275) 9(2.938,-2.275) 10(2.938,-1.625) 11(2.938,-0.975) 12(2.938,-0.325) 13(2.938,0.325) 14(2.938,0.975) 15(2.938,1.625) 16(2.938,2.275)
  silkscreen extent -3.67,-2.5 1.85,2.85, body extent -3.2,-2.5 3.2,2.5, height 1.2
TAJ_1210 [mm]
  rect 2.3x3.2 smd: 1(-1.75,0) 2(1.75,0)
  silkscreen extent -3.8,-1.65 -3.8,1.65
TEMT6200FX01_L [mm]
  rect 0.76x1.195 smd: 1(-0.774,0) 2(0.774,0)
  silkscreen extent -1.52,-0.25 -1.52,0.25
TSSOP16 [mm]
  rect 1.5x0.45 smd: 1(0,0)
  oval 1.5x0.45 smd: 2(0,-0.65) 3(0,-1.3) 4(0,-1.95) 5(0,-2.6) 6(0,-3.25) 7(0,-3.9) 8(0,-4.55) 9(5.8,-4.55) 10(5.8,-3.9) 11(5.8,-3.25) 12(5.8,-2.6) 13(5.8,-1.95) 14(5.8,-1.3) 15(5.8,-0.65) 16(5.8,0)
  silkscreen extent 1.58,-4.88 4.22,0.33
UNIOHM_R_0805 [mm]
  rect 1.2x1.4 smd: 1(-1,0) 2(1,0)
  silkscreen extent -1.91,-0.89 1.91,0.89
VQFN_16 [mm] "TLV62130"
  oval 0.6x0.24 smd: 1(-1.4,0.75)
  rect 0.6x0.24 smd: 2(-1.4,0.25) 3(-1.4,-0.25) 4(-1.4,-0.75) 9(1.4,-0.75) 10(1.4,-0.25) 11(1.4,0.25) 12(1.4,0.75)
  rect 0.24x0.6 smd: 5(-0.75,-1.4) 6(-0.25,-1.4) 7(0.25,-1.4) 8(0.75,-1.4) 13(0.75,1.4) 14(0.25,1.4) 15(-0.25,1.4) 16(-0.75,1.4)
  rrect5% 1.68x1.68 smd: 17(0,0)
  silkscreen extent -1.4,-1.41 1.39,1.38
YAGEO_R_0805 [mm]
  rect 1x1.35 smd: 1(-1,0) 2(1,0)
  silkscreen extent -1.78,-0.89 1.78,0.89

## Part data
ADC_SIG_MUX ADG_MUX1: "Integrated Circuit", Manufacturer_Name="Analog Devices", Mouser Part Number=584-ADG708BRUZ-R, Arrow Part Number=ADG708BRUZ-REEL, Arrow Price/Stock=https://www.arrow.com/en/products/adg708bruz-reel/analog-devices?region=nac, Datasheet Link=https://www.arrow.com/en/products/adg708bruz-reel/analog-devices, Height=1.2mm, Manufacturer_Part_Number=ADG708BRUZ-REEL, Mouser Price/Stock=https://www.mouser.co.uk/ProductDetail/Analog-Devices/ADG708BRUZ-REEL?qs=BpaRKvA4VqGF5OXTTV6ylw%3D%3D
ADC_SIG_MUX_C1 Amp_Grp_Mux_C3 C_ADG1 C_LTC1_1_U_sensor_block_unit_4_1 C_LTC1_1_U_sensor_block_unit_4_2 C_LTC1_1_U_sensor_block_unit_4_3 C_LTC1_1_U_sensor_block_unit_4_4 C_LTC4_1_U_sensor_block_unit_4_1 C_LTC4_1_U_sensor_block_unit_4_2 C_LTC4_1_U_sensor_block_unit_4_3 C_LTC4_1_U_sensor_block_unit_4_4 C_PWR_1 C_REF C_REF2 C_SN2: library part Cap, "贴片电容（MLCC） 0402 100nF ±10% 25V X7R", LatestRevisionDate=17-Jul-2002, LatestRevisionNote="Re-released for DXP Platform.", PackageDescription="Radial Cap, Thru-Hole; 2 Leads; 0.3 in Pin Spacing", PackageReference=RAD-0.3, Published=8-Jun-2000, Publisher="Altium Limited"
ADC_SIG_MUX_C2 Amp_Grp_Mux_C2 C_ADG2 C_SN_1: library part Cap, "贴片电容（MLCC） 0402 1µF ±10% 25V X5R", LatestRevisionDate=17-Jul-2002, LatestRevisionNote="Re-released for DXP Platform.", PackageDescription="Radial Cap, Thru-Hole; 2 Leads; 0.3 in Pin Spacing", PackageReference=RAD-0.3, Published=8-Jun-2000, Publisher="Altium Limited"
ADC_SIG_MUX_C3 Amp_Grp_Mux_C1 C_ADG3 C_ADS7827_1 C_ADS7827_HMAX1 C_PWR_2: library part "Cap Pol1", "Polarized Capacitor (Radial)", LatestRevisionDate=17-Jul-2002, LatestRevisionNote="Re-released for DXP Platform.", PackageDescription="Polarized Capacitor (Radial); 2 Leads", PackageReference=RB7.6-15, Published=8-Jun-2000, Publisher="Altium Limited"
adding_base Amp_Grp1_amp_P_o_of Amp_Grp1_P_base_o_of Amp_Grp1_ref_debug Amp_Grp2_amp_o_of Amp_Grp2_P_base_o_of Amp_Grp_Mux_P_base filter_P_o_of: library part "Header 2", "圆针/方针:方针,塑高:2.54mm,安装方式:直插,工作温度:-65℃~+125℃,总PIN位数:3P,排数:单排,插针结构:-,行距:-,触头材质:磷青铜,触头镀层:锡,配合针长度:-,间距:2.54mm,颜色:黑色,额定电压:-,额定电流:3A", LatestRevisionDate=17-Jul-2002, LatestRevisionNote="Re-released for DXP Platform.", Publisher="Altium Limited"
Adding_r1 Adding_r2 Adding_r3 Adding_r4: library part Res1, "Thin Film Resistors - SMD 10K OHMS 0.1% 0805 Anti-Sulfur", LatestRevisionDate=17-Jul-2002, LatestRevisionNote="Re-released for DXP Platform.", PackageDescription="Axial Device, Thru-Hole; 2 Leads; 0.3 in Pin Spacing", PackageReference=AXIAL-0.3, Published=8-Jun-2000, Publisher="Altium Limited"
ADS7829: library part ADS7829, "Analog to Digital Converters - ADC 12-Bit Hi-Speed 2.7V MicroPower Sampling"
Amp_Grp1_amp Amp_Grp2_amp: "Integrated Circuit", Manufacturer_Name="Analog Devices", Mouser Part Number=584-LT6370IMS8#TRPBF, Arrow Part Number=LT6370IMS8#TRPBF, Arrow Price/Stock=https://www.arrow.com/en/products/lt6370ims8trpbf/analog-devices?region=nac, Datasheet Link=https://datasheet.datasheetarchive.com/originals/distributors/Datasheets_SAMA/8ef5c487163893b5f5c9e5c0bce714ce.pdf, Height=1.1mm, Manufacturer_Part_Number=LT6370IMS8#TRPBF, Mouser Price/Stock=https://www.mouser.co.uk/ProductDetail/Analog-Devices/LT6370IMS8TRPBF?qs=BJlw7L4Cy7%2FHk4kAcs%252B4mA%3D%3D
Amp_Grp1_amp_C1 Amp_Grp1_DAC1_C1 Amp_Grp1_DAC2_C1 Amp_Grp1_filter_C1 Amp_Grp1_filter_C2 Amp_Grp1_ref_C1 Amp_Grp1_ref_C2 Amp_Grp2_amp_C1 Amp_Grp2_DAC1_C1 Amp_Grp2_DAC2_C2 Amp_Grp2_filter2_C1 Amp_Grp2_filter2_C2 Amp_Grp2_filter_C1 Amp_Grp2_filter_C2 C4p IC_adder_C1 IC_adder_C2 IC_adding_base_C1 IC_adding_base_C2 IC_filter_C1 IC_filter_C2: library part Cap, "贴片电容（MLCC） 0805 100nF ±10% 50V X7R", LatestRevisionDate=17-Jul-2002, LatestRevisionNote="Re-released for DXP Platform.", PackageDescription="Radial Cap, Thru-Hole; 2 Leads; 0.3 in Pin Spacing", PackageReference=RAD-0.3, Published=8-Jun-2000, Publisher="Altium Limited"
Amp_Grp1_DAC1 Amp_Grp1_DAC2 Amp_Grp2_DAC1 Amp_Grp2_DAC2: "Integrated Circuit", Manufacturer_Name="Texas Instruments", Mouser Part Number=595-DAC53608RTER, Arrow Part Number=DAC53608RTER, Arrow Price/Stock=https://www.arrow.com/en/products/dac53608rter/texas-instruments, Datasheet Link=https://datasheet.datasheetarchive.com/originals/distributors/Datasheets_SAMA/31e6133a56d84334c2130e2ecbea856a.pdf, Height=0.8mm, Manufacturer_Part_Number=DAC53608RTER, Mouser Price/Stock=https://www.mouser.co.uk/ProductDetail/Texas-Instruments/DAC53608RTER?qs=PqoDHHvF64%2FKbH7LWqNf3Q%3D%3D
Amp_Grp1_filter Amp_Grp1_ref Amp_Grp2_filter Amp_Grp2_filter_2 IC_adder IC_adding_base IC_filter: "Integrated Circuit", Manufacturer_Name="Texas Instruments", Mouser Part Number=595-OPA188AQDGKRQ1, Arrow Part Number=OPA188AQDGKRQ1, Arrow Price/Stock=https://www.arrow.com/en/products/opa188aqdgkrq1/texas-instruments?region=nac, Datasheet Link=http://www.ti.com/lit/gpn/opa188-q1, Height=1.1mm, Manufacturer_Part_Number=OPA188AQDGKRQ1, Mouser Price/Stock=https://www.mouser.co.uk/ProductDetail/Texas-Instruments/OPA188AQDGKRQ1?qs=5aG0NVq1C4ySuPyCJqaS5w%3D%3D
Amp_Grp1_filter_C3 Amp_Grp1_filter_C4 Amp_Grp2_filter2_C3 Amp_Grp2_filter2_C4 Amp_Grp2_filter_C3 Amp_Grp2_filter_C4: library part Cap, "Multilayer Ceramic Capacitors MLCC - SMD/SMT 0.010uF +-10% 200V", LatestRevisionDate=17-Jul-2002, LatestRevisionNote="Re-released for DXP Platform.", PackageDescription="Radial Cap, Thru-Hole; 2 Leads; 0.3 in Pin Spacing", PackageReference=RAD-0.3, Published=8-Jun-2000, Publisher="Altium Limited"
Amp_Grp1_filter_R1 Amp_Grp1_filter_R2 Amp_Grp2_filter2_R1 Amp_Grp2_filter2_R2 Amp_Grp2_filter_R1 Amp_Grp2_filter_R2: library part Res1, "Thick Film Resistors - SMD 1 kOhms 1/2 W 0805 1 % AEC-Q200", LatestRevisionDate=17-Jul-2002, LatestRevisionNote="Re-released for DXP Platform.", PackageDescription="Axial Device, Thru-Hole; 2 Leads; 0.3 in Pin Spacing", PackageReference=AXIAL-0.3, Published=8-Jun-2000, Publisher="Altium Limited"
Amp_Grp1_ref_trimmer Amp_Grp1_VR Amp_Grp2_VR: "Variable Resistor", Manufacturer_Name=Bourns, Mouser Part Number=652-3224W-1-104G, Arrow Part Number=3224W-1-104G, Arrow Price/Stock=https://www.arrow.com/en/products/3224w-1-104g/bourns, Datasheet Link=https://www.bourns.com/docs/product-datasheets/3224.pdf?sfvrsn=c872982f_10, Height=5.55mm, Manufacturer_Part_Number=3224W-1-104G, Mouser Price/Stock=https://www.mouser.co.uk/ProductDetail/Bourns/3224W-1-104G?qs=tEaODSGlU8NOeIAULE3a4g%3D%3D
Amp_Grp1_VR_P Amp_Grp2_VR_P P_VCC1 P_VCC2 P_VCC_ADS7829: library part "Header 3", "排针 直针 单排 间距2.54mm 镀金 14Pin(1X14Pin)", LatestRevisionDate=17-Jul-2002, LatestRevisionNote="Re-released for DXP Platform.", Publisher="Altium Limited"
Amp_Grp_Mux: "Integrated Circuit", Manufacturer_Name="Analog Devices", Mouser Part Number=584-ADG726BSUZ, Arrow Part Number=ADG726BSUZ, Arrow Price/Stock=https://www.arrow.com/en/products/adg726bsuz/analog-devices?region=europe, Datasheet Link=https://www.analog.com/media/en/technical-documentation/data-sheets/ADG726_732.pdf, Height=1.2mm, Manufacturer_Part_Number=ADG726BSUZ, Mouser Price/Stock=https://www.mouser.co.uk/ProductDetail/Analog-Devices/ADG726BSUZ?qs=BpaRKvA4VqHCQkaid0DsDg%3D%3D
C1p: library part "Cap Pol1", "A3216-18 4.7µF ±10% 25V 3.1Ω 3.20 x 1.60mm 1.60mm 156mA", LatestRevisionDate=17-Jul-2002, LatestRevisionNote="Re-released for DXP Platform.", PackageDescription="Polarized Capacitor (Radial); 2 Leads", PackageReference=RB7.6-15, Published=8-Jun-2000, Publisher="Altium Limited"
C2p C_ADS7827_2 C_ADS7827_HMAX2: library part Cap, "50V, 0.1uF, 0805", LatestRevisionDate=17-Jul-2002, LatestRevisionNote="Re-released for DXP Platform.", PackageDescription="Radial Cap, Thru-Hole; 2 Leads; 0.3 in Pin Spacing", PackageReference=RAD-0.3, Published=8-Jun-2000, Publisher="Altium Limited"
C3p: library part Cap, "贴片电容（MLCC） 1206 22µF ±10% 10V X5R", LatestRevisionDate=17-Jul-2002, LatestRevisionNote="Re-released for DXP Platform.", PackageDescription="Radial Cap, Thru-Hole; 2 Leads; 0.3 in Pin Spacing", PackageReference=RAD-0.3, Published=8-Jun-2000, Publisher="Altium Limited"
C4_U_fanout_8_ADDR1 C4_U_fanout_8_ADDR2 C4_U_fanout_8_ADDR3 C4_U_fanout_8_ADDR4: library part Cap, "贴片电容（MLCC） 0402 10µF ±20% 10V X5R", LatestRevisionDate=17-Jul-2002, LatestRevisionNote="Re-released for DXP Platform.", PackageDescription="Radial Cap, Thru-Hole; 2 Leads; 0.3 in Pin Spacing", PackageReference=RAD-0.3, Published=8-Jun-2000, Publisher="Altium Limited"
C5_U_fanout_8_ADDR1 C5_U_fanout_8_ADDR2 C5_U_fanout_8_ADDR3 C5_U_fanout_8_ADDR4: library part Cap, "贴片电容（MLCC） 0402 1µF ±10% 10V X5R", LatestRevisionDate=17-Jul-2002, LatestRevisionNote="Re-released for DXP Platform.", PackageDescription="Radial Cap, Thru-Hole; 2 Leads; 0.3 in Pin Spacing", PackageReference=RAD-0.3, Published=8-Jun-2000, Publisher="Altium Limited"
C5p: library part Cap, "贴片电容（MLCC） 0805 3.3nF ±10% 50V X7R", LatestRevisionDate=17-Jul-2002, LatestRevisionNote="Re-released for DXP Platform.", PackageDescription="Radial Cap, Thru-Hole; 2 Leads; 0.3 in Pin Spacing", PackageReference=RAD-0.3, Published=8-Jun-2000, Publisher="Altium Limited"
C10_U_fanout_8_ADDR1 C10_U_fanout_8_ADDR2 C10_U_fanout_8_ADDR3 C10_U_fanout_8_ADDR4: library part Cap, "贴片电容（MLCC） 0402 100nF ±10% 25V X5R", LatestRevisionDate=17-Jul-2002, LatestRevisionNote="Re-released for DXP Platform.", PackageDescription="Radial Cap, Thru-Hole; 2 Leads; 0.3 in Pin Spacing", PackageReference=RAD-0.3, Published=8-Jun-2000, Publisher="Altium Limited"
C_ADS7827_3 C_ADS7827_HMAX3: library part Cap, "贴片电容（MLCC） 0805 1nF ±5% 50V X7R", LatestRevisionDate=17-Jul-2002, LatestRevisionNote="Re-released for DXP Platform.", PackageDescription="Radial Cap, Thru-Hole; 2 Leads; 0.3 in Pin Spacing", PackageReference=RAD-0.3, Published=8-Jun-2000, Publisher="Altium Limited"
C_LTC2_1_U_sensor_block_unit_4_1 C_LTC2_1_U_sensor_block_unit_4_2 C_LTC2_1_U_sensor_block_unit_4_3 C_LTC2_1_U_sensor_block_unit_4_4 C_LTC3_1_U_sensor_block_unit_4_1 C_LTC3_1_U_sensor_block_unit_4_2 C_LTC3_1_U_sensor_block_unit_4_3 C_LTC3_1_U_sensor_block_unit_4_4: library part Cap, "Multilayer Ceramic Capacitors MLCC - SMD/SMT 50V 1000pF X7R 0402 10%", LatestRevisionDate=17-Jul-2002, LatestRevisionNote="Re-released for DXP Platform.", PackageDescription="Radial Cap, Thru-Hole; 2 Leads; 0.3 in Pin Spacing", PackageReference=RAD-0.3, Published=8-Jun-2000, Publisher="Altium Limited"
C_POW1 C_POW2: library part Cap, "贴片电容（MLCC） 0805 10nF ±5% 100V X7R", LatestRevisionDate=17-Jul-2002, LatestRevisionNote="Re-released for DXP Platform.", PackageDescription="Radial Cap, Thru-Hole; 2 Leads; 0.3 in Pin Spacing", PackageReference=RAD-0.3, Published=8-Jun-2000, Publisher="Altium Limited"
CDCLVC1108_1_U_fanout_8_ADDR1 CDCLVC1108_1_U_fanout_8_ADDR2 CDCLVC1108_1_U_fanout_8_ADDR3 CDCLVC1108_1_U_fanout_8_ADDR4: library part CDCLV1108, "时钟缓冲器,驱动器 CDCLVC1108PWR TSSOP-16"
FB1_U_fanout_8_ADDR1 FB1_U_fanout_8_ADDR2 FB1_U_fanout_8_ADDR3 FB1_U_fanout_8_ADDR4: library part Inductor, "贴片磁珠 0402 50Ω@100MHz ±25%", Value1=50ohm, Code_IEC=1005, Code_JEITA=0402, LatestRevisionDate=29-May-2009, LatestRevisionNote="IPC-7351 Footprint Added.", PackageDescription="Chip Inductor", PackageReference=0402-A, Published=8-Jun-2000, Publisher="Altium Limited"
J4 J5 J6 J7: library part "Header 14", "排针 直针 单排 间距2.54mm 镀金 14Pin(1X14Pin)", LatestRevisionDate=17-Jul-2002, LatestRevisionNote="Re-released for DXP Platform.", Publisher="Altium Limited"
J_waveshare: "Connector", Manufacturer_Name=Molex, Mouser Part Number=538-70246-1201, Datasheet Link=https://datasheet.datasheetarchive.com/originals/distributors/Datasheets-DGA22/2151895.pdf, Height=9.27mm, Manufacturer_Part_Number=70246-1201, Mouser Price/Stock=https://www.mouser.co.uk/ProductDetail/Molex/70246-1201?qs=fJMuCzod2IK5EwAAa91t%252Bg%3D%3D
L1p: library part Inductor, "Inductor,0630, 2.2uH", Code_IEC=1005, Code_JEITA=0402, LatestRevisionDate=29-May-2009, LatestRevisionNote="IPC-7351 Footprint Added.", PackageDescription="Chip Inductor", PackageReference=0402-A, Published=8-Jun-2000, Publisher="Altium Limited"
LTC1_U_sensor_block_unit_4_1 LTC1_U_sensor_block_unit_4_2 LTC1_U_sensor_block_unit_4_3 LTC1_U_sensor_block_unit_4_4: library part LTC6561, "Transimpedance Amplifiers 4 channel transimpedance amplifier"
P_ADS7829_IN P_PT_DEBUG: library part "Header 2", "排针 直针 单排 间距2.54mm 镀金 14Pin(1X14Pin)", LatestRevisionDate=17-Jul-2002, LatestRevisionNote="Re-released for DXP Platform.", Publisher="Altium Limited"
P_C1p: library part Cap, "Capacitor, 10uF, 1206", LatestRevisionDate=17-Jul-2002, LatestRevisionNote="Re-released for DXP Platform.", PackageDescription="Radial Cap, Thru-Hole; 2 Leads; 0.3 in Pin Spacing", PackageReference=RAD-0.3, Published=8-Jun-2000, Publisher="Altium Limited"
P_PT P_VCC5: library part "Header 2", "CONN HEADER SMD 2POS MICROFIT", LatestRevisionDate=17-Jul-2002, LatestRevisionNote="Re-released for DXP Platform.", Publisher="Altium Limited"
photo_transistor_1_U_sensor_block_unit_4_1 photo_transistor_1_U_sensor_block_unit_4_2 photo_transistor_1_U_sensor_block_unit_4_3 photo_transistor_1_U_sensor_block_unit_4_4 photo_transistor_2_U_sensor_block_unit_4_1 photo_transistor_2_U_sensor_block_unit_4_2 photo_transistor_2_U_sensor_block_unit_4_3 photo_transistor_2_U_sensor_block_unit_4_4 photo_transistor_3_U_sensor_block_unit_4_1 photo_transistor_3_U_sensor_block_unit_4_2 photo_transistor_3_U_sensor_block_unit_4_3 photo_transistor_3_U_sensor_block_unit_4_4 photo_transistor_4_U_sensor_block_unit_4_1 photo_transistor_4_U_sensor_block_unit_4_2 photo_transistor_4_U_sensor_block_unit_4_3 photo_transistor_4_U_sensor_block_unit_4_4: library part PhotoTransistor, "SENSOR PHOTO 550NM TOP VIEW 0805"
R1 R2 R3: library part Res1, "Thick Film Resistors - SMD RMC 0402 1/16W 5% T/R-10000", LatestRevisionDate=17-Jul-2002, LatestRevisionNote="Re-released for DXP Platform.", PackageDescription="Axial Device, Thru-Hole; 2 Leads; 0.3 in Pin Spacing", PackageReference=AXIAL-0.3, Published=8-Jun-2000, Publisher="Altium Limited"
R1p: library part Res1, "Resistor, 100K,0805", LatestRevisionDate=17-Jul-2002, LatestRevisionNote="Re-released for DXP Platform.", PackageDescription="Axial Device, Thru-Hole; 2 Leads; 0.3 in Pin Spacing", PackageReference=AXIAL-0.3, Published=8-Jun-2000, Publisher="Altium Limited"
R2p: library part Res1, "Resistor,0805, 750K", LatestRevisionDate=17-Jul-2002, LatestRevisionNote="Re-released for DXP Platform.", PackageDescription="Axial Device, Thru-Hole; 2 Leads; 0.3 in Pin Spacing", PackageReference=AXIAL-0.3, Published=8-Jun-2000, Publisher="Altium Limited"
R3p: library part Res1, "贴片电阻 0805 240KΩ ±1% 1/8W ±100ppm/℃", LatestRevisionDate=17-Jul-2002, LatestRevisionNote="Re-released for DXP Platform.", PackageDescription="Axial Device, Thru-Hole; 2 Leads; 0.3 in Pin Spacing", PackageReference=AXIAL-0.3, Published=8-Jun-2000, Publisher="Altium Limited"
R_adding R_ADS7829_max1 R_ADS7829_min: library part "RPot SM", "Trimmer Resistors - SMD 4mm 2Kohms 10% Square Cermet Sealed", ComponentLink1Description="Manufacturer Link", ComponentLink1URL=http://bourns.com/2/search.html, DatasheetVersion=Oct-2003, PackageDescription="Square Trimming Potentiometer", PackageReference=POT4MM-2, Published=17-Dec-2003, Publisher="Altium Limited"
R_POW1 R_POW2: library part Res2, "49.9 Ohms ±1% 0.125W，1/8W 芯片电阻 0805（2012 公制） 厚膜", LatestRevisionDate=17-Jul-2002, LatestRevisionNote="Re-released for DXP Platform.", PackageDescription="Axial Device, Thru-Hole; 2 Leads; 0.4 in Pin Spacing", PackageReference=AXIAL-0.4, Published=8-Jun-2000, Publisher="Altium Limited"
SN1: library part SN74HC138, "解码器/编码器 TSSOP16_5X4.4MM 1 x 3:8 2V~6V"
TLV1p: library part TLV62130, "功能类型：降压型 输出类型：可调 输入电压：3~17V 输出电压：900mV~5V 输出电流(最大值)：3A"

## Free pads (board coordinates)
  round 78.74 smd paste+0 mask+39.37: 1(1070,2370) 1(6165,2170) 1(6205,4870)
  round 78.74 smd far side paste+0 mask+39.37: 1(1070,2370) 1(6165,2170) 1(6205,4870)

## Via types
v1: diameter 13.78, hole 7.87, Top Layer to Bottom Layer, 282 vias
v2: diameter 19.68, hole 11.81, Top Layer to Bottom Layer, 187 vias
v3: diameter 20, hole 11, Top Layer to Bottom Layer, 4 vias

## Nets (pads, with @x,y where several pads share a name; then routed paths per layer and width w, separated by ;. In a path a pad name is that pad's centre, name@x,y a point inside that pad or via, vN(x,y) a via of type N, cw(c..) or ccw(c..) an arc to the next point about the centre after c; other vN are vias at no path point)
-Vbias: C_POW2.1 photo_transistor_1_U_sensor_block_unit_4_1.2 photo_transistor_1_U_sensor_block_unit_4_2.2 photo_transistor_1_U_sensor_block_unit_4_3.2 photo_transistor_1_U_sensor_block_unit_4_4.2 photo_transistor_2_U_sensor_block_unit_4_1.2 photo_transistor_2_U_sensor_block_unit_4_2.2 photo_transistor_2_U_sensor_block_unit_4_3.2 photo_transistor_2_U_sensor_block_unit_4_4.2 photo_transistor_3_U_sensor_block_unit_4_1.2 photo_transistor_3_U_sensor_block_unit_4_2.2 photo_transistor_3_U_sensor_block_unit_4_3.2 photo_transistor_3_U_sensor_block_unit_4_4.2 photo_transistor_4_U_sensor_block_unit_4_1.2 photo_transistor_4_U_sensor_block_unit_4_2.2 photo_transistor_4_U_sensor_block_unit_4_3.2 photo_transistor_4_U_sensor_block_unit_4_4.2 R_POW2.2 | length 3302.1
  Top Layer w15: R_POW2.2@1511.67,2508.5 C_POW2.1@1600,2508.5
  Bottom Layer w15: v2(3615,2325) 3615,2326.27 3628.73,2340 3673.31,2340 3684.76,2351.46 3684.76,2360.02 3692.22,2367.48 photo_transistor_4_U_sensor_block_unit_4_1.2@3700.79,2367.48 ; v2(3620,2395) 3655,2430 3766.16,2430 3828.71,2492.55 3828.71,2499.24 3849.71,2520.24 photo_transistor_3_U_sensor_block_unit_4_1.2@3858.27,2520.24 ; v2(3640,2635) 3640.9,2635.9 3655.13,2635.9 3692.22,2672.99 photo_transistor_4_U_sensor_block_unit_4_3.2@3700.79,2672.99 ; v2(3640,2720) 3725,2720 3772.01,2672.99 photo_transistor_1_U_sensor_block_unit_4_3.2@3858.27,2672.99 ; v2(3645,2500) 3645.9,2500.9 3645.9,2510.18 3655.95,2520.24 photo_transistor_2_U_sensor_block_unit_4_1.2@3700.79,2520.24 ; v2(3645,2825) 3645.75,2825.75 photo_transistor_2_U_sensor_block_unit_4_3.2@3700.79,2825.75 ; v2(3645,2880) 3660,2895 3825,2895 3858.27,2861.73 photo_transistor_3_U_sensor_block_unit_4_3.2@3858.27,2825.75 ; v2(3650,2370) 3680,2400 3740,2400 3772.52,2367.48 photo_transistor_1_U_sensor_block_unit_4_1.2@3858.27,2367.48 ; photo_transistor_4_U_sensor_block_unit_4_2.2@4015.75,2367.48 4067.52,2367.48 4115,2320 4115,2300 4175,2240 v2(4295,2240) ; photo_transistor_2_U_sensor_block_unit_4_2.2@4015.75,2520.24 4015.75,2550.75 4035,2570 4056.99,2570 4070.49,2556.5 4202.66,2556.5 4211.16,2565 v2(4300,2565) ; photo_transistor_4_U_sensor_block_unit_4_4.2@4015.75,2672.99 4092.99,2672.99 4140,2720 4290,2720 4299.47,2710.53 v2(4300,2710.53) ; photo_transistor_2_U_sensor_block_unit_4_4.2@4015.75,2825.75 4070.75,2825.75 4110,2865 v2(4300,2865) ; photo_transistor_1_U_sensor_block_unit_4_2.2@4173.23,2367.48 4262.52,2367.48 4295,2335 v2(4295,2280) ; photo_transistor_3_U_sensor_block_unit_4_2.2@4173.23,2520.24 4293.5,2520.24 4303.73,2510 v2(4305,2510) ; photo_transistor_1_U_sensor_block_unit_4_4.2@4173.23,2672.99 4292.01,2672.99 v2(4300,2665) ; photo_transistor_3_U_sensor_block_unit_4_4.2@4173.23,2825.75 4299.25,2825.75 v2(4300,2825)
  other v1: 1830,2450 1860,2450 1830,2473.33 1860,2473.33 1830,2496.67 1860,2496.67 1830,2520 1860,2520
-VCC_PT: P_PT.1 P_PT_DEBUG.1 R_POW1.1 | length 476.4
  Top Layer w15: P_PT.1@858.54,2508.5 858.54,2648.54 955,2745 P_PT_DEBUG.1@1155,2745
ADC_SIG: ADC_SIG_MUX.8 P_ADS7829_IN.1 | length 388.4
  Top Layer w15: ADC_SIG_MUX.8@5235.67,4409.57 5350,4409.57 5385,4374.57 P_ADS7829_IN.1@5385,4150
ADC_SIG_ADDR0: ADC_SIG_MUX.1 J4.4 J7.4 | length 2521.7
  Top Layer w10: v2(5165,4230) 5165.86,4229.14 5174.14,4229.14 5175.43,4230.43 ADC_SIG_MUX.1@5235.67,4230.43 ; v2(5270,3940) 5270,3885 5309,3846 5309,2361 5455,2215 J7.4@5530,2215 J4.4@5770,2215
  Bottom Layer w10: v2(5165,4230) 5165,4045 v2(5270,3940)
ADC_SIG_ADDR1: ADC_SIG_MUX.16 J4.5 J7.5 | length 2455.3
  Top Layer w10: ADC_SIG_MUX.16@5004.33,4230.43 5064.57,4230.43 5080,4215 5080,4170 5295,3955 5295,3882.63 5325,3852.63 5325,2440 5450,2315 J7.5@5530,2315 J4.5@5770,2315
ADC_SIG_ADDR2: ADC_SIG_MUX.15 J4.13 J7.13 | length 1670.2
  Top Layer w10: ADC_SIG_MUX.15@5003.82,4255.51 ADC_SIG_MUX.15@5004.33,4256.02 5073.98,4256.02 5102.5,4227.5 5102.5,4177.5 5320,3960 5320,3880.25 5350,3850.25 5350,3250 5485,3115 J7.13@5530,3115 J4.13@5770,3115
  Top Layer w15: J4.13@5767.5,3112.5 J4.13@5770,3115
ADS7829_CS: ADS7829.5 J4.8 J7.8 | length 1914
  Top Layer w10: J7.8@5530,2615 J4.8@5770,2615 5928,2615 6040,2727 6040,3640 5739.08,3940.92 5720.28,3940.92 ADS7829.5@5720.12,3941.08
ADS7829_D_CLOCK: ADS7829.7 J4.6 J7.6 | length 2280.2
  Top Layer w10: J7.6@5530,2415 J4.6@5770,2415 5900,2415 6150,2665 6150,3650 5807.74,3992.26 ADS7829.7@5720.12,3992.26
ADS7829_D_OUT: ADS7829.6 J4.7 J7.7 | length 2104.8
  Top Layer w10: J7.7@5530,2515 J4.7@5770,2515 5920,2515 6100,2695 6100,3640 5774.43,3965.57 5721.22,3965.57 ADS7829.6@5720.12,3966.67
ADS7829_IN: ADS7829.2 P_ADS7829_IN.2 | length 248.8
  Top Layer w10: P_ADS7829_IN.2@5385,4050 5445,4050 5502.74,3992.26 ADS7829.2@5609.88,3992.26
ADS7829_MAX: C_ADS7827_HMAX1.1 C_ADS7827_HMAX2.2 C_ADS7827_HMAX3.2 R1.1 R_ADS7829_max1.W | length 1180.7
  Top Layer w15: R1.1@5505.31,4099.47 5505.31,4230.31 5640,4365 5923.39,4365 5988.39,4430 C_ADS7827_HMAX3.2@5989.37,4430 C_ADS7827_HMAX2.2@5989.37,4550 6001.04,4561.67 C_ADS7827_HMAX1.1@6001.04,4715.83 6001.04,4826.61 5948.91,4878.74 R_ADS7829_max1.W@5941.04,4878.74